# Altium PCB ADM32F036QN56Q_BLDC_Demo_Rev1.0.PcbDoc (part 1 of 2)
Units mm, origin at the board's own origin, x right, y up, seen from the top; angles counter-clockwise.
Board outline 100.03 x 60.1 mm, 4 copper layers (Top Layer, S1, S2, Bottom Layer), stack 0.778 mm thick; 155 components, 87 nets, 444 pads, 417 vias.
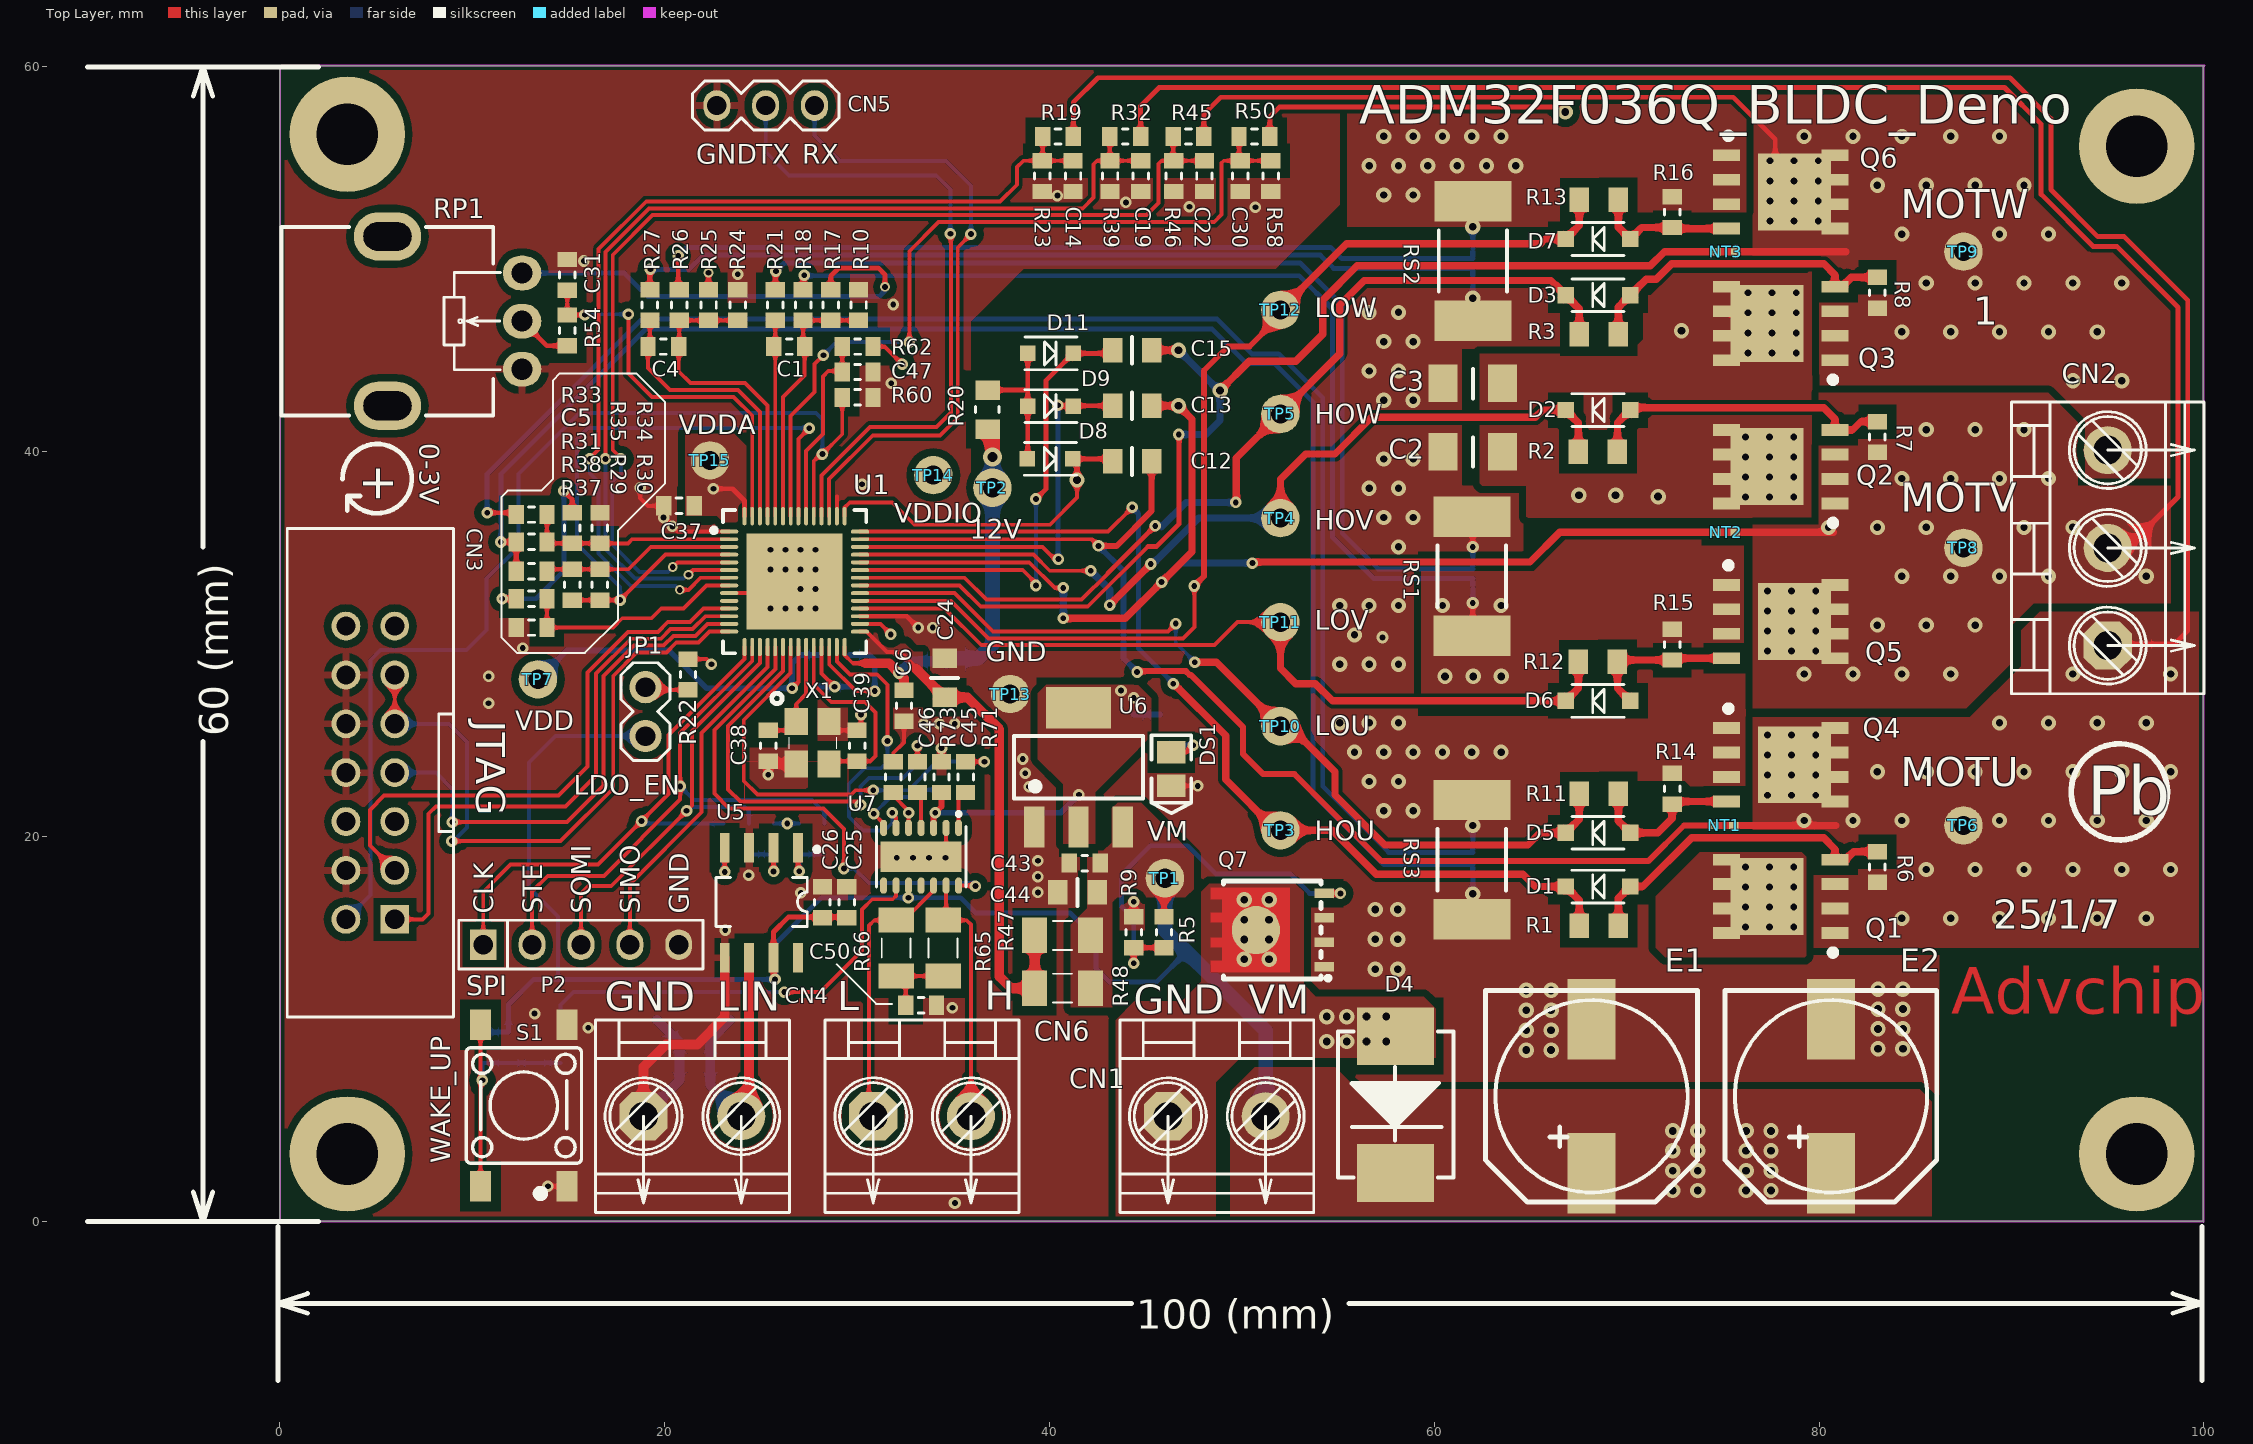
[diagram p0: Top Layer view]
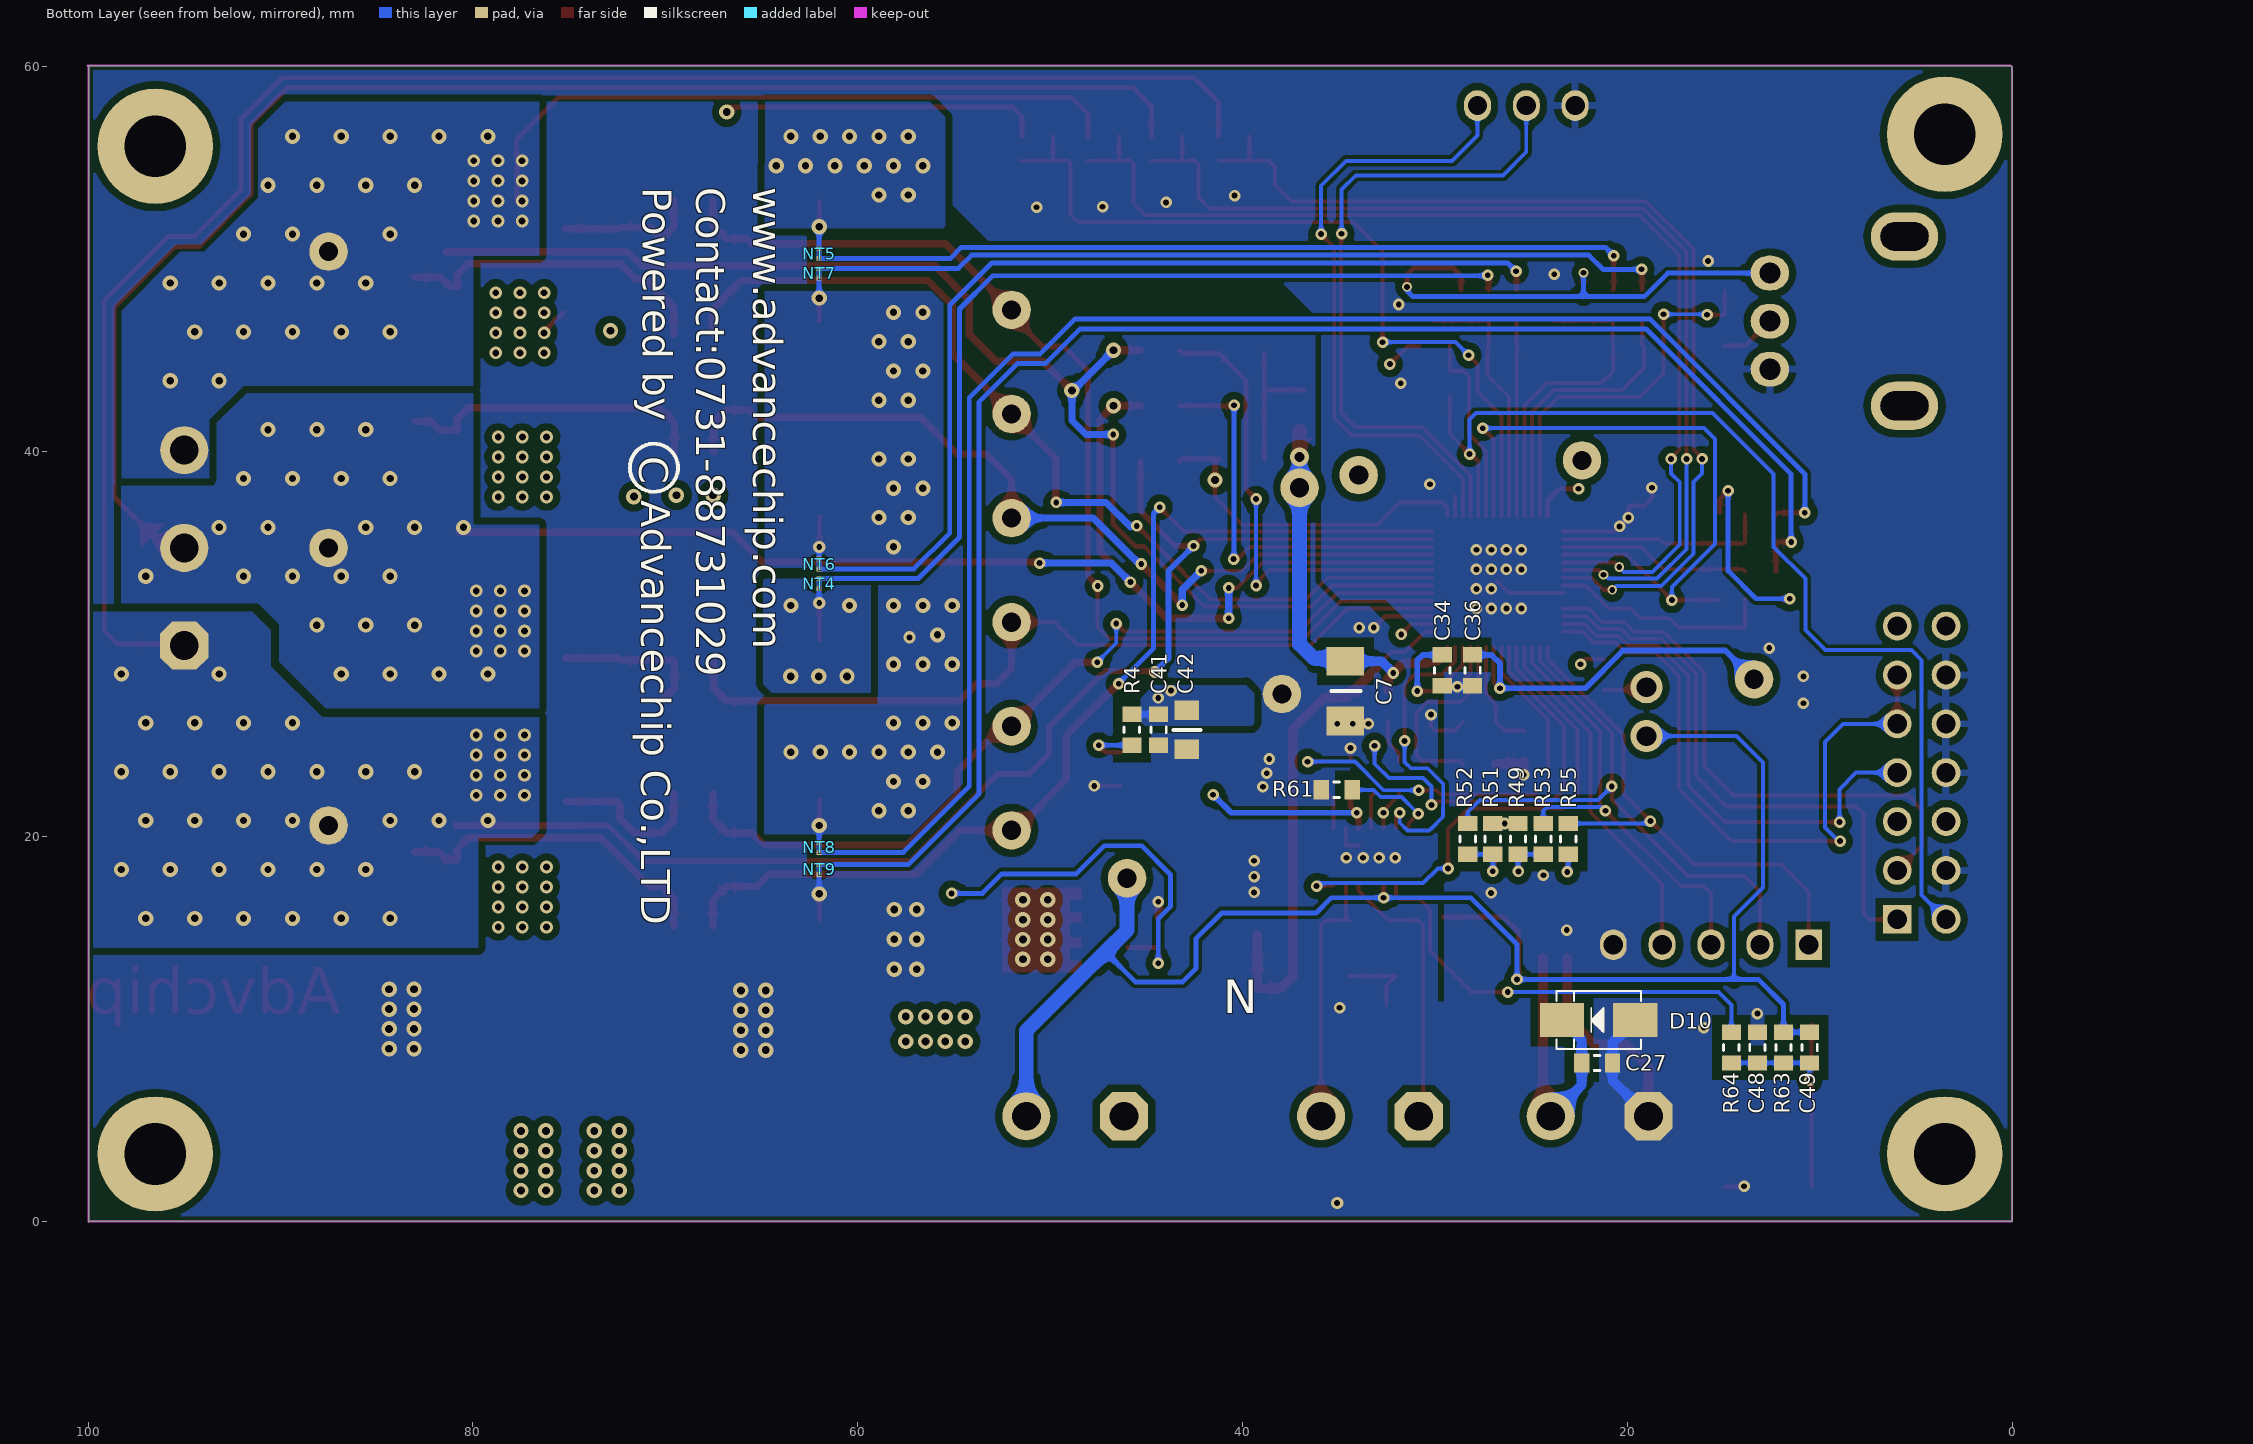
[diagram p1: Bottom Layer view, seen from below]
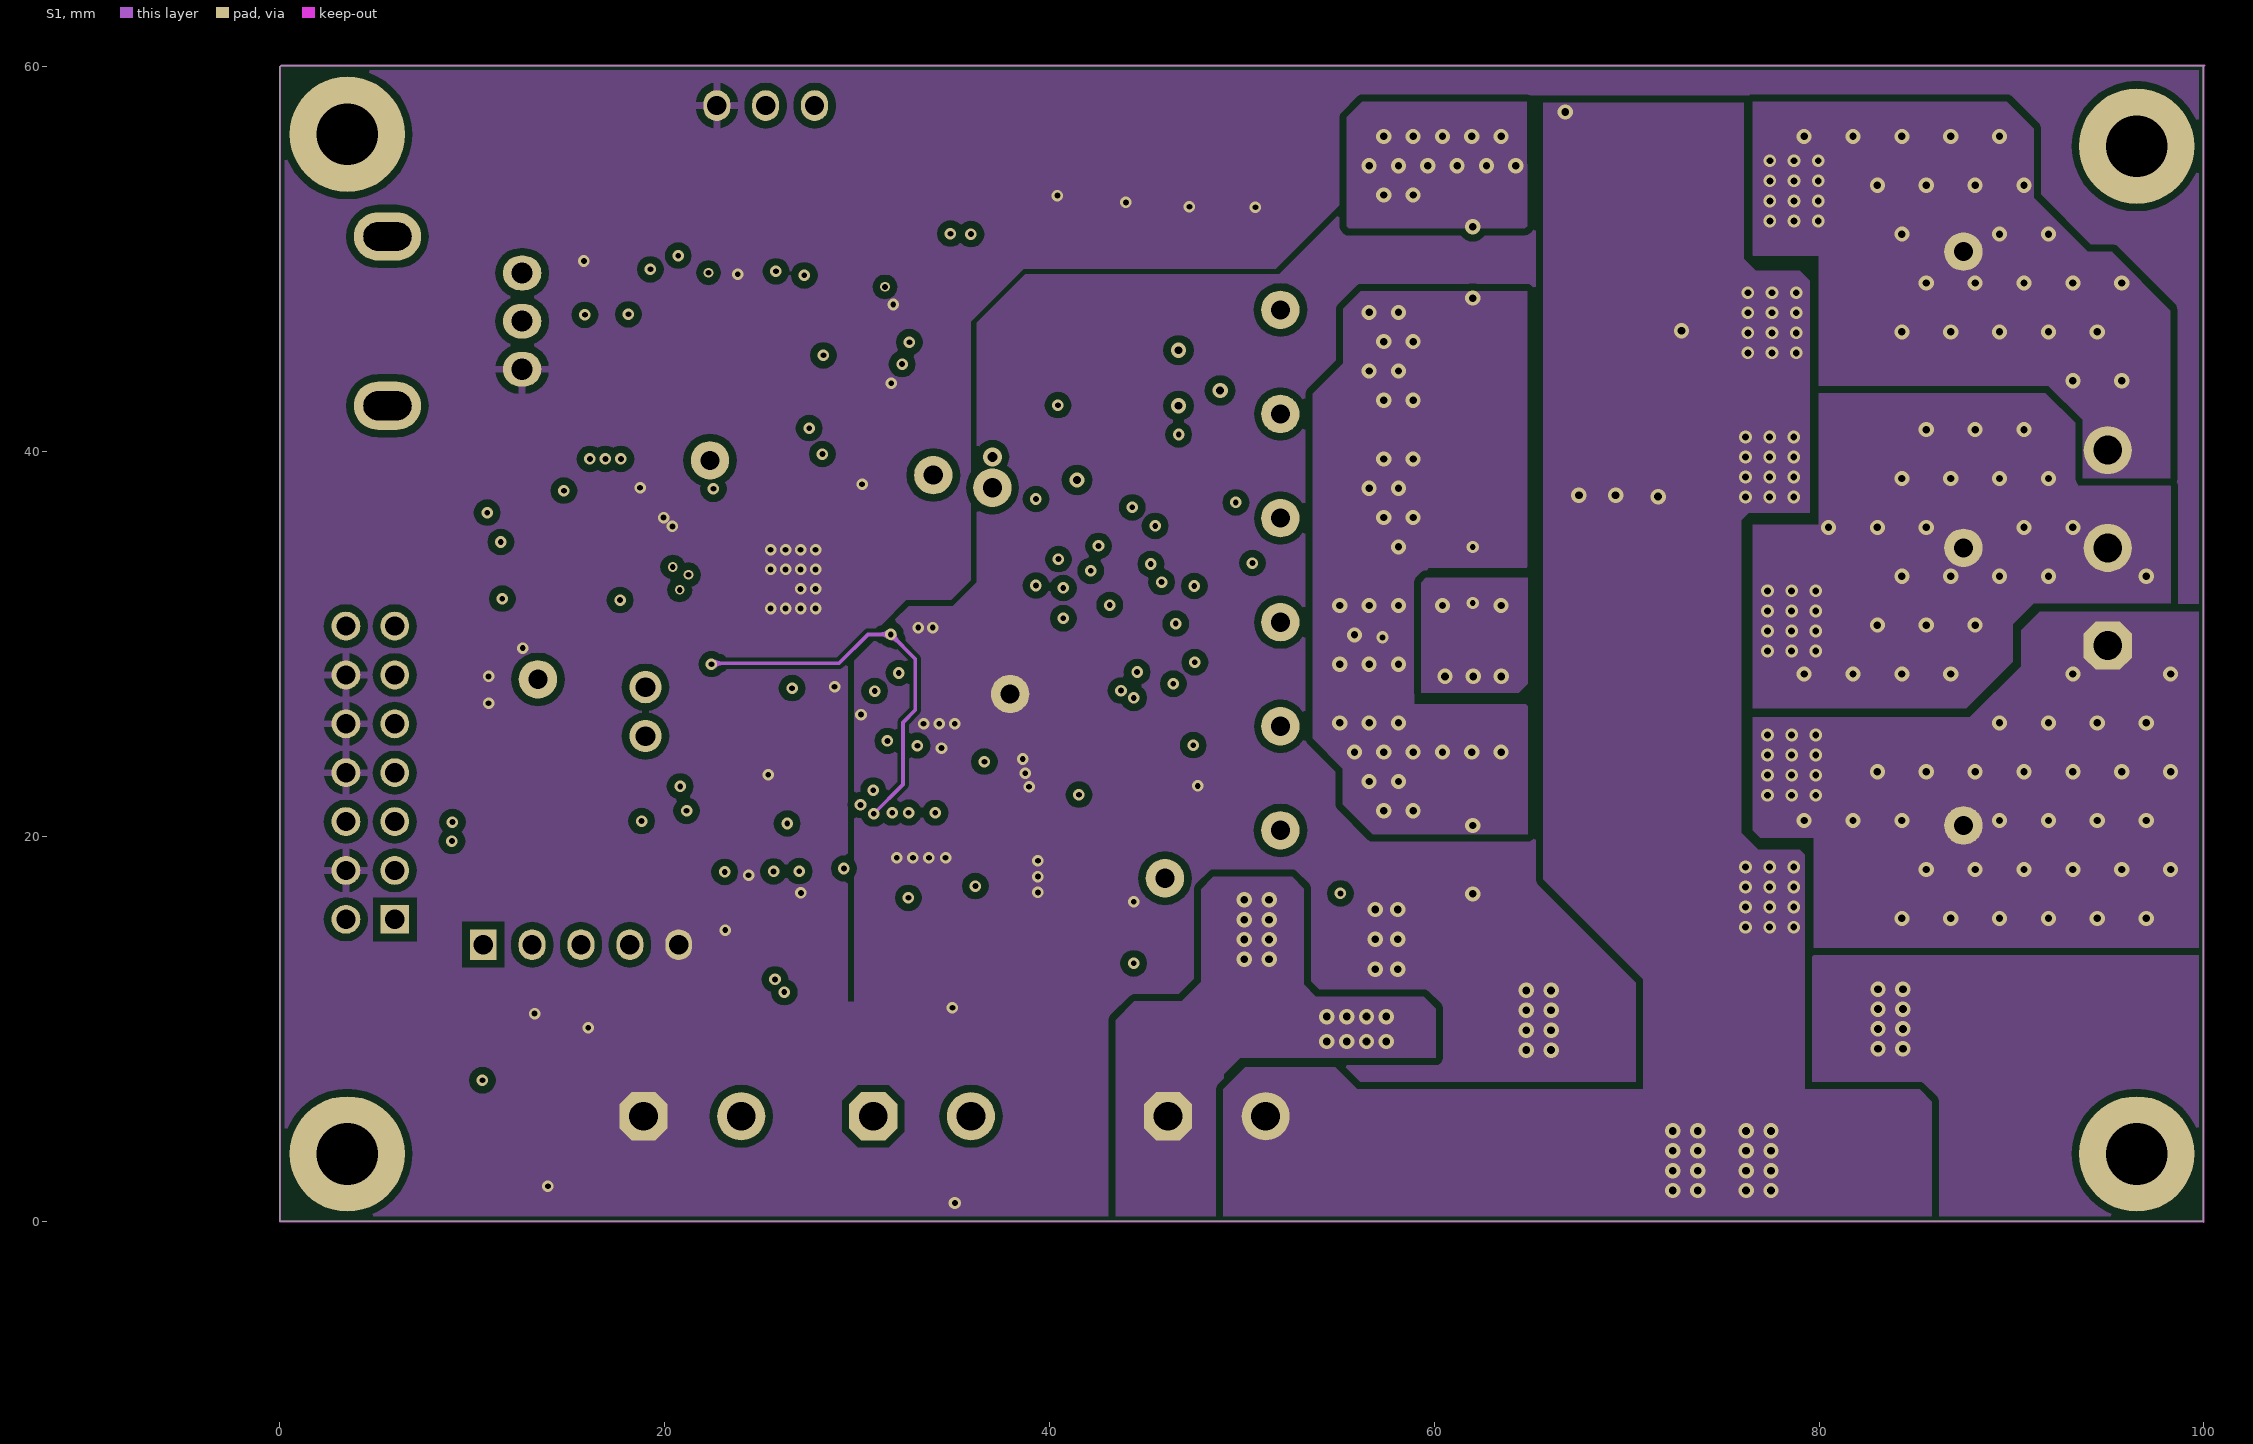
[diagram p2: S1]
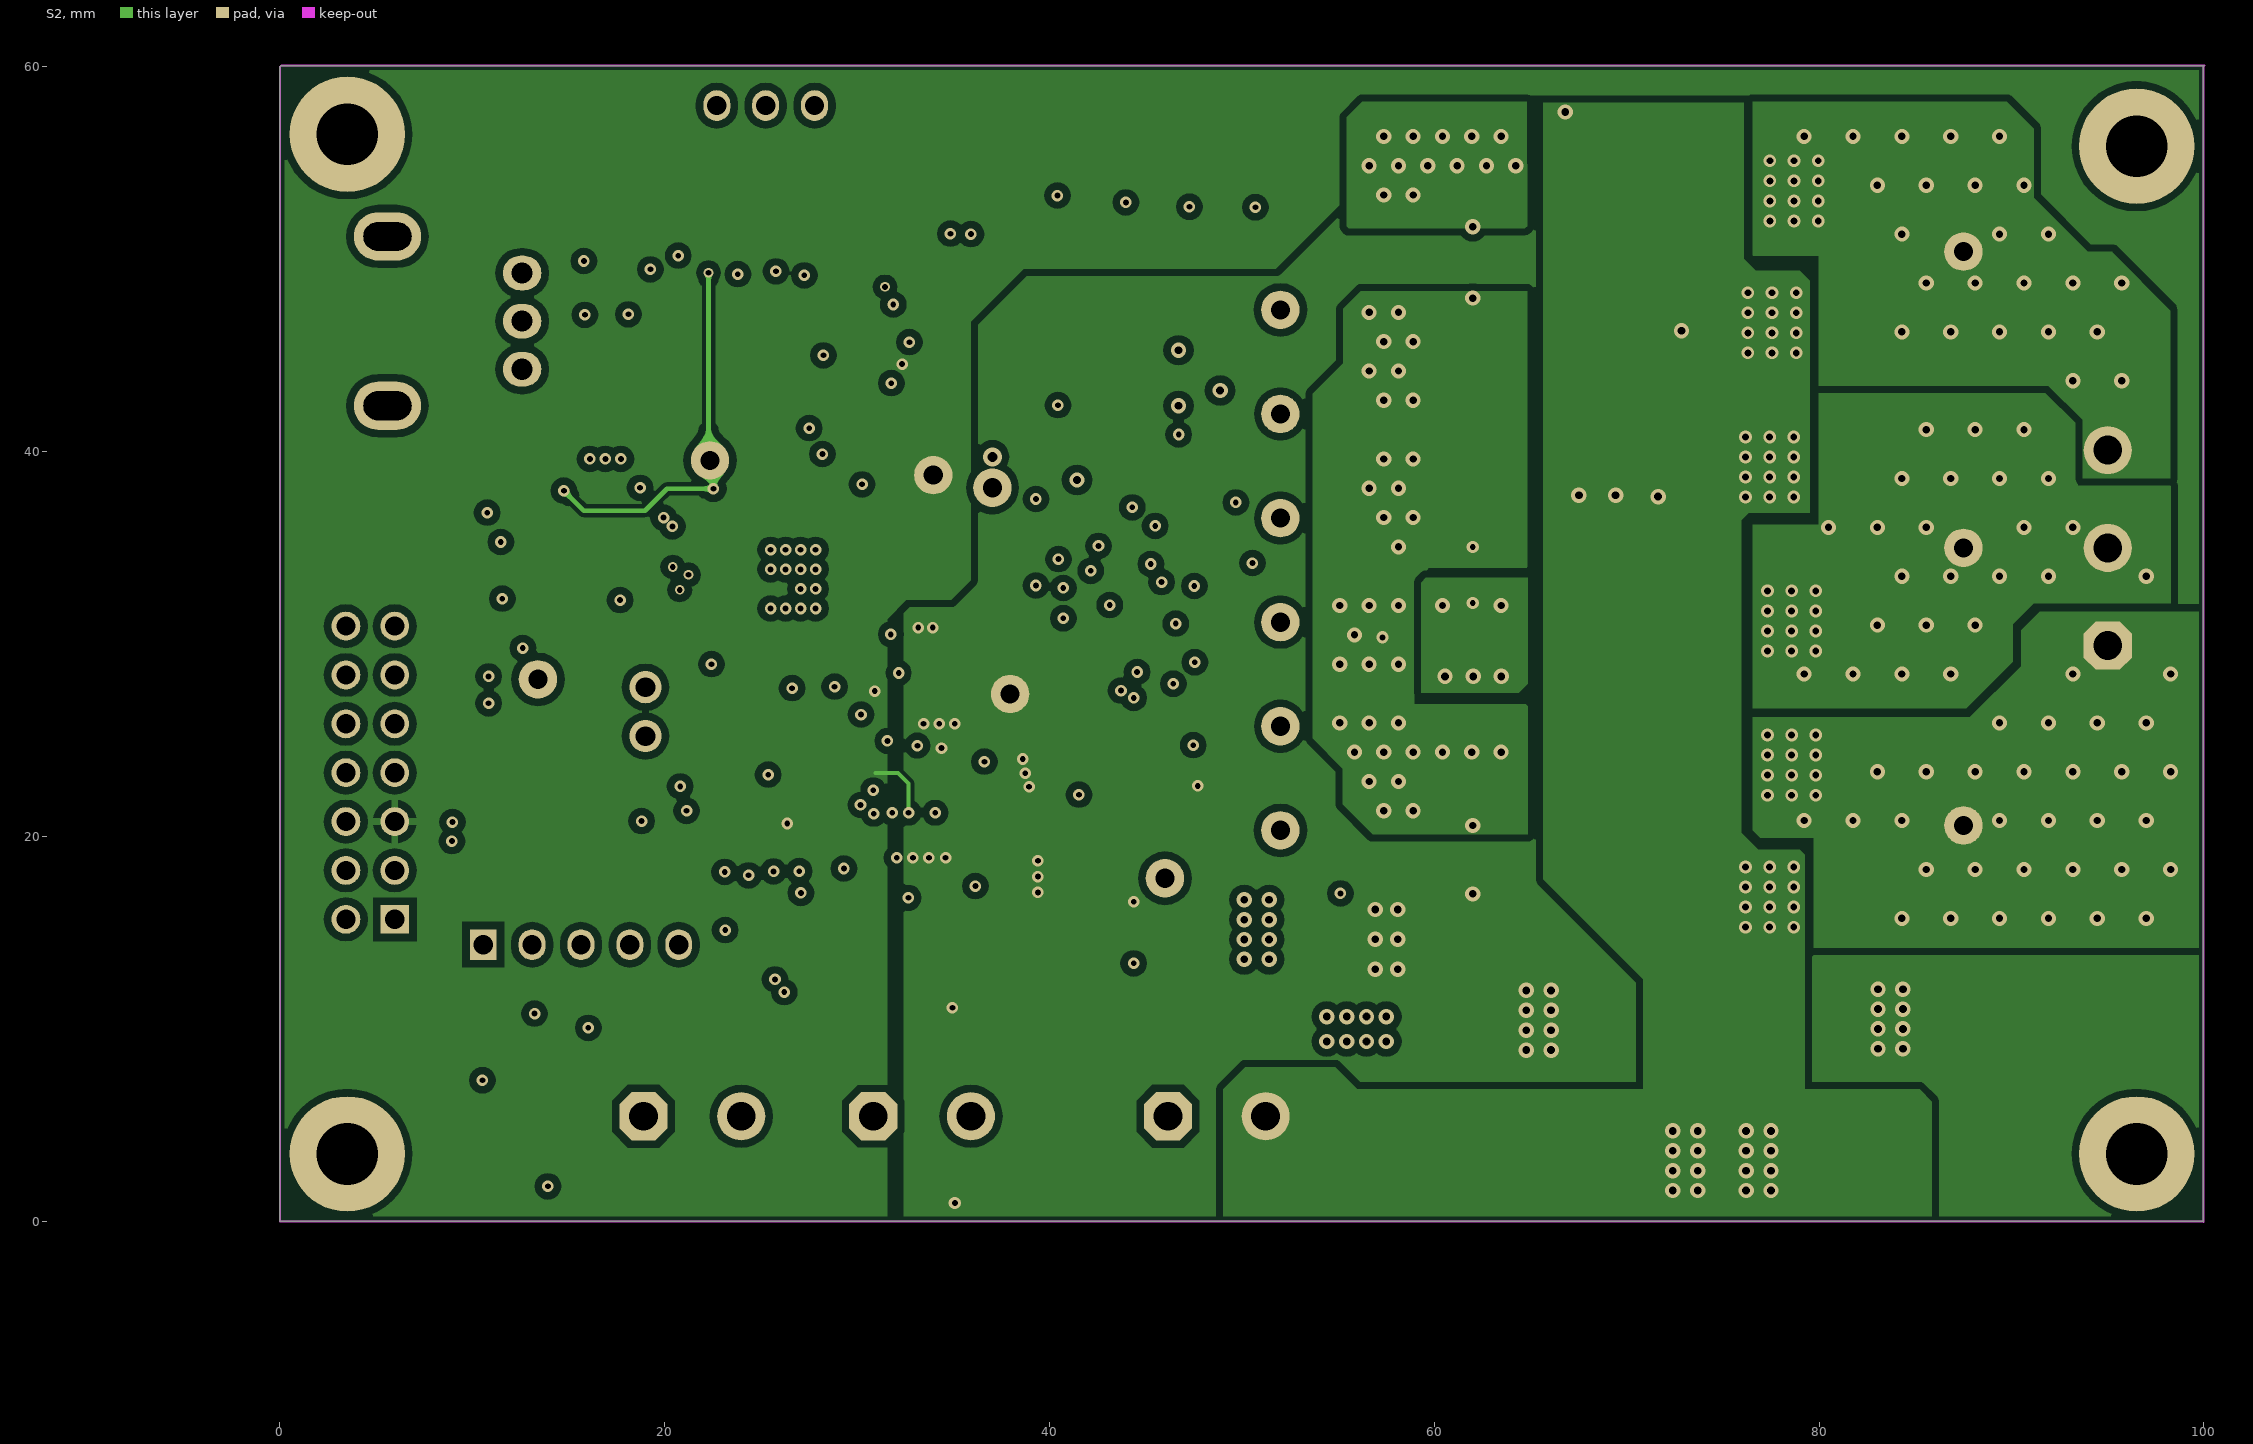
[diagram p3: S2]
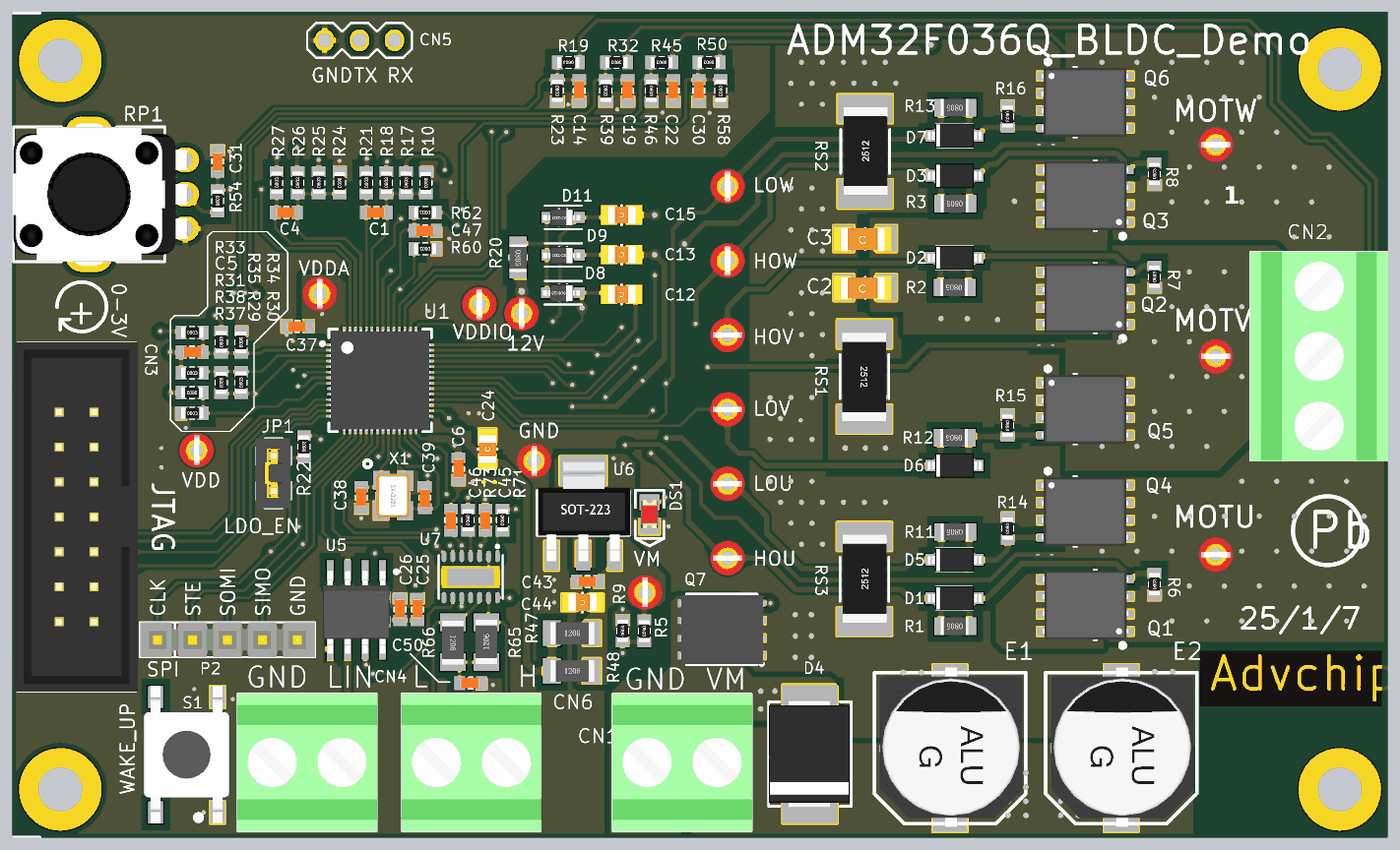
[diagram p5: 3D render of the assembled board from above, using the file's embedded part models]
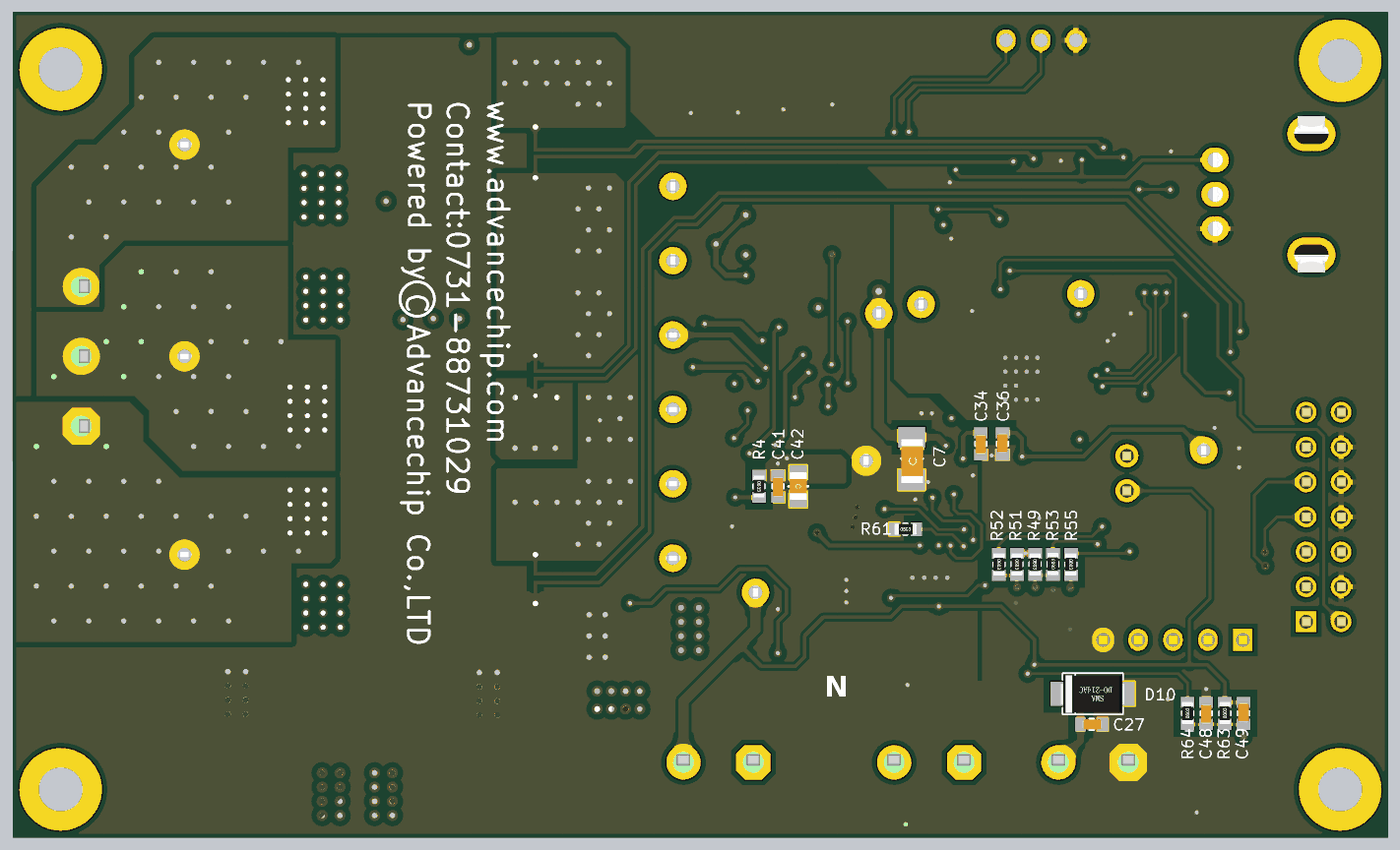
[diagram p6: 3D render of the assembled board from below, using the file's embedded part models]

## Layer stack, top to bottom
Top Solder: solder mask 0.0102, Solder Resist, Dk 3.5
Top Layer: signal copper 0.0356
Dielectric 1: core 0.254, FR-4, Dk 4.2
S1: signal copper 0.036
Dielectric 3: prepreg 0.127, Dk 4.2
S2: signal copper 0.036
Dielectric 2: core 0.254, Dk 4.2
Bottom Layer: signal copper 0.0356
Bottom Solder: solder mask 0.0102, Solder Resist, Dk 3.5

## Board outline
0,0 0,60 0.071,60.071 100.025,60.071 99.975,60.02 99.975,-0.025 99.949,0

## Design rules (kind name [scope] priority, off if disabled: settings)
Clearance Clearance_U1 [InComponent('U1')] p1: gap=0.152 ignorepadtopadclearanceinfootprint=FALSE except(0.381: SMDPad-Fill SMDPad-Poly SMDPad-Region)
Clearance Clearance_T1T2 [(InComponent('T1') OR InComponent('T2'))] p2: gap=0.152 ignorepadtopadclearanceinfootprint=FALSE except(0.254: SMDPad-Fill SMDPad-Poly SMDPad-Region)
Clearance [All] p3: gap=0.203 ignorepadtopadclearanceinfootprint=FALSE except(0.152: Arc-Arc Arc-Track Arc-SMDPad Track-Track Track-SMDPad SMDPad-SMDPad; 0.381: THPad-Fill THPad-Poly THPad-Region Via-Fill Via-Poly Via-Region Fill-Fill Fill-Poly Fill-Region Poly-Poly Poly-Region Region-Region; 0.508: SMDPad-Fill SMDPad-Poly SMDPad-Region)
HoleSize [All] p1: absolutevalues=TRUE maxlimit=20 minlimit=0.025 maxpercent=80.000 minpercent=20.000
MinimumSolderMaskSliver [All] p1: minsoldermaskwidth=0.025
PlaneClearance [All] p1: clearance=0.254
PlaneConnect [InNet('GND')] p1: planeconnectstyle=Relief reliefexpansion=0.508 reliefentries=4 reliefconductorwidth=0.254 reliefairgap=0.254
PolygonConnect PolygonConnect_PAD [(HasFootprint('J-DG128-5') OR HasFootprint('SIP8A') OR HasFootprint('IDC14-L') OR HasFootprint('SIP6A') OR HasFootprint('SO-8') OR HasFootprint('SIP3A') OR HasFootprint('RK09K1130') OR HasFootprint('QFN56-7X7-04P'))] p1: thpad.connectstyle=Relief thpad.reliefconductorwidth=0.381 thpad.reliefentries=4 thpad.polygonreliefangle="90 Angle" thpad.airgapwidth=0.381 smdpad.connectstyle=Relief smdpad.reliefconductorwidth=0.381 smdpad.reliefentries=4 smdpad.polygonreliefangle="90 Angle" smdpad.airgapwidth=0.254 via.connectstyle=Direct via.reliefconductorwidth=0.254 via.reliefentries=4 via.polygonreliefangle="90 Angle" via.airgapwidth=0.254
PolygonConnect [All] p2: connectstyle=Direct reliefconductorwidth=0.254 reliefentries=4 polygonreliefangle="90 Angle" airgapwidth=0.254
RoutingVias [All] p1: holewidth=0.3 width=0.6 viastyle="Through Hole" minholewidth=0.3 minwidth=0.5 maxholewidth=0.711 maxwidth=1.27
SilkToBoardRegionClearance [All] p1 off:
SilkToSilkClearance [All] p1 off: silktosilkclearance=0.254
SilkToSolderMaskClearance [IsPad] p1 off: minsilkscreentomaskgap=0.254 clearancetoexposedcopper=TRUE
SolderMaskExpansion [All] p1: expansion=0.102
Width [All] p1: maxlimit=2.54 minlimit=0.152 preferedwidth=0.203
23 further rules are at their usual default settings.

## Classes and differential pairs
component class BLDC_Driver: C2 C3 C12 C13 C14 C15 C19 C22 C30 C31 C41 C42 C43 C44 CN1 CN2 D1 D2 D3 D4 D5 D6 D7 D8 D9 D11 DS1 E1 E2 NT1 NT2 NT3 NT4 NT5 NT6 NT7 NT8 NT9 Q1 Q2 Q3 Q4 Q5 Q6 Q7 R1 R2 R3 R4 R5 R6 R7 R8 R9 R11 R12 R13 R14 R15 R16 R19 R20 R23 R32 R39 R45 R46 R50 R54 R58 RP1 RS1 RS2 RS3 TP1 TP3 TP4 TP5 TP6 TP8 TP9 TP10 TP11 TP12 TP13 TP28 U6
component class ADM32F036QN56Q: C1 C4 C5 C6 C7 C24 C25 C26 C27 C34 C36 C37 C38 C39 C45 C46 C47 C48 C49 C50 CN3 CN4 CN5 CN6 D10 JP1 P2 R10 R17 R18 R21 R22 R24 R25 R26 R27 R29 R30 R31 R33 R34 R35 R37 R38 R47 R48 R49 R51 R52 R53 R55 R60 R61 R62 R63 R64 R65 R66 R71 R73 S1 TP2 TP7 TP14 TP15 U1 U5 U7 X1

## Components (designator, comment, footprint, x,y, rotation, side; value= is the part's Value field where it differs from the comment)
C1 "NC" C0603 26.473,45.464 r180 top
C2 "1uF/50V" C1206 62,40.005 r180 top value=1uF
C3 "1uF/50V" C1206 62,43.561 r180 top value=1uF
C4 "NC" C0603 19.928,45.464 r180 top
C5 "100pF" C0603 13.079,35.312 r0 top
C6 "0.1uF/50V" C0603 32.436,26.797 r90 top value="TDK C3216X7R1V106KT000E"
C7 "10uF/50V" C1206 34.646,27.56 r270 bottom
C12 "2.2uF/50V" C0805 44.291,39.497 r180 top
C13 "2.2uF/50V" C0805 44.291,42.386 r180 top
C14 "47nF/25V" C0603 41.221,54.324 r90 top value=47nF
C15 "2.2uF/50V" C0805 44.291,45.276 r180 top
C19 "47nF/25V" C0603 44.739,54.324 r90 top value=47nF
C22 "47nF/25V" C0603 48.05,54.324 r90 top value=47nF
C24 "10uF/50V" C0805 34.544,28.245 r90 top
C25 "0.1uF/50V" C0603 29.464,16.586 r90 top value="TDK C3216X7R1V106KT000E"
C26 "2.2uF/50V" C0603 28.194,16.586 r90 top value="TDK C3216X7R1V106KT000E"
C27 "100pF" C0603 21.565,8.23 r180 bottom value="TDK C3216X7R1V106KT000E"
C30 "0.1uF/50V" C0603 49.905,54.324 r90 top
C31 "0.1uF/50V" C0603 14.935,49.189 r270 top value="TDK C3216X7R1V106KT000E"
C34 "2.2uF/25V" C0603 29.616,28.637 r270 bottom value=2.2uF
C36 "2.2uF/25V" C0603 28.042,28.637 r90 bottom value=2.2uF
C37 "2.2uF/25V" C0603 20.739,37.186 r180 top
C38 "22pF/50V" C0603 25.375,24.714 r90 top value=100pF
C39 "22pF/50V" C0603 29.997,24.714 r270 top value=100pF
C41 "0.1uF/50V" C0603 44.36,25.545 r270 bottom value=0.1uF
C42 "10uF/50V" C0805 42.887,25.545 r270 bottom
C43 "0.1uF/50V" C0603 41.828,18.618 r180 top value=0.1uF
C44 "10uF/50V" C0805 41.453,17.094 r180 top
C45 "0.1uF/50V" C0603 34.383,23.089 r270 top value=0.1uF
C46 "0.1uF/50V" C0603 31.877,23.089 r270 top value=0.1uF
C47 "0.1uF/50V" C0603 30.025,44.143 r180 top value="TDK C3216X7R1V106KT000E"
C48 "22nF/50V" C0603 13.234,9.031 r270 bottom value=0.1uF
C49 "0.1uF/50V" C0603 10.524,9.031 r90 bottom value=0.1uF
C50 "4.7nF/50V" C0603 33.325,11.227 r180 top value=0.1uF
CN1 "EK508V-02P" J-EK508V-02P 48.692,5.461 r0 top
CN2 "EK508V-03P" J-EK508V-03P 95,35 r90 top
CN3 "2.54-2X7P" IDC14-L 4.699,23.317 r90 top
CN4 "EK508V-02P" J-EK508V-02P 21.438,5.461 r0 top
CN5 "2.54-3p" sip3a 25.248,57.988 r180 top
CN6 "EK508V-02P" J-EK508V-02P 33.376,5.461 r0 top
D1 "1N4148W" sod-123 68.5,17.399 r180 top
D2 "1N4148W" sod-123 68.5,42.164 r180 top
D3 "1N4148W" sod-123 68.5,48.133 r180 top
D4 "SMCJ26CA" SMC 57.988,6.071 r90 top
D5 "1N4148W" sod-123 68.5,20.193 r180 top
D6 "1N4148W" sod-123 68.5,27.051 r180 top
D7 "1N4148W" sod-123 68.5,51.054 r180 top
D8 "1N4148WS" SOD-323 40.03,39.624 r180 top
D9 "1N4148WS" SOD-323 40.044,42.367 r180 top
D10 "SMAJ18CA" SMA 21.488,10.461 r180 bottom
D11 "1N4148WS" SOD-323 40.044,45.11 r180 top
DS1 "绿色LED" SMD_LED0805_LED 46.33,23.506 r90 top
E1 "100uF/50V" CAP_SMD10*10 68.167,6.5 r90 top
E2 "100uF/50V" CAP_SMD10*10 80.613,6.5 r90 top
JP1 "XH2.54-2P" SIP2C 18.999,26.492 r90 top
NT1 "Net-Tie" Net-Tie_15mil 75.057,20.574 r0 top net-tie
NT2 "Net-Tie" Net-Tie_15mil 75.133,35.814 r0 top net-tie
NT3 "Net-Tie" Net-Tie_15mil 75.152,50.4 r0 top net-tie
NT4 "Net-Tie" Net-Tie_10mil#1 62.001,33.147 r90 bottom net-tie
NT5 "Net-Tie" Net-Tie_10mil#2 62.001,50.292 r90 bottom net-tie
NT6 "Net-Tie" Net-Tie_10mil#1 62.001,34.163 r270 bottom net-tie
NT7 "Net-Tie" Net-Tie_10mil#1 62,49.276 r90 bottom net-tie
NT8 "Net-Tie" Net-Tie_10mil#2 62,19.431 r90 bottom net-tie
NT9 "Net-Tie" Net-Tie_10mil#1 62,18.288 r90 bottom net-tie
P2 "XH2.54-5P母座" SIP5 10.566,14.376 r0 top
Q1 "AD65N10" "POWER 56" 78,16.891 r90 bottom
Q2 "AD65N10" "POWER 56" 78,39.219 r90 bottom
Q3 "AD65N10" "POWER 56" 78,46.662 r90 bottom
Q4 "AD65N10" "POWER 56" 78,23.729 r270 bottom
Q5 "AD65N10" "POWER 56" 78,31.172 r270 bottom
Q6 "AD65N10" "POWER 56" 78,53.5 r270 bottom
Q7 "YJG150N03A" DFN5*6 52.502,15.138 r90 top
R1 "22R" R0805 68.548,15.367 r180 top value=1K
R2 "22R" R0805 68.5,40.005 r180 top value=1K
R3 "22R" R0805 68.548,46.101 r180 top value=1K
R4 "4.7KΩ" R0603 45.745,25.545 r270 bottom value=1K
R5 "10KΩ" R0603 45.949,15.024 r270 top value=1K
R6 "10KΩ" R0603 83.026,18.415 r90 top
R7 "10KΩ" R0603 83.026,40.767 r90 top
R8 "10KΩ" R0603 83.026,48.26 r90 top
R9 "100KΩ" R0603 44.374,15.024 r90 top value=1K
R10 "18K" R0603 30.074,47.625 r270 top value=1K
R11 "22R" R0805 68.548,22.225 r180 top value=1K
R12 "22R" R0805 68.5,29.083 r180 top value=1K
R13 "22R" R0805 68.548,53.086 r180 top value=1K
R14 "10KΩ" R0603 72.358,22.479 r270 top
R15 "10KΩ" R0603 72.358,29.972 r270 top
R16 "10KΩ" R0603 72.358,52.451 r270 top
R17 "18K" R0603 28.632,47.625 r90 top value=1K
R18 "3K" R0603 27.191,47.625 r90 top value=1K
R19 "150KΩ 1%" R0603 40.439,56.382 r180 top
R20 "20R" R0805 36.779,42.189 r270 top
R21 "0R" R0603 25.749,47.625 r90 top value=1K
R22 "100KΩ" R0603 21.209,28.423 r90 top value=1K
R23 "10KΩ 1%" R0603 39.626,54.324 r270 top
R24 "18K" R0603 23.8,47.625 r270 top value=1K
R25 "18K" R0603 22.276,47.625 r90 top value=1K
R26 "3K" R0603 20.752,47.625 r90 top value=1K
R27 "0R" R0603 19.228,47.625 r90 top value=1K
R29 "30KΩ" R0603 15.193,33.088 r270 top value=1K
R30 "30KΩ" R0603 16.63,33.088 r90 top value=1K
R31 "1KΩ" R0603 13.079,33.788 r0 top value=1K
R32 "150KΩ 1%" R0603 43.934,56.382 r180 top
R33 "1KΩ" R0603 13.079,36.735 r0 top value=1K
R34 "30KΩ" R0603 16.63,36.035 r270 top value=1K
R35 "30KΩ" R0603 15.193,36.035 r90 top value=1K
R37 "NC" R0603 13.079,30.861 r0 top value=1K
R38 "NC" R0603 13.079,32.36 r180 top value=1K
R39 "10KΩ 1%" R0603 43.144,54.324 r270 top
R45 "150KΩ 1%" R0603 47.221,56.382 r180 top
R46 "10KΩ 1%" R0603 46.455,54.324 r270 top
R47 "0R" R1206 40.678,14.859 r0 top
R48 "0R" R1206 40.678,12.116 r0 top
R49 "10K" R0603 25.679,19.876 r270 bottom
R50 "150KΩ 1%" R0603 50.648,56.382 r180 top
R51 "10K" R0603 26.987,19.876 r270 bottom
R52 "100R" R0603 28.296,19.876 r270 bottom
R53 "100R" R0603 24.371,19.876 r90 bottom
R54 "1KΩ" R0603 14.935,46.304 r90 top value=1K
R55 "100R" R0603 23.063,19.876 r270 bottom
R58 "10KΩ 1%" R0603 51.5,54.324 r270 top
R60 "2.2KΩ" R0603 30.025,42.823 r180 top value=1K
R61 "100KΩ" R0603 35.103,22.428 r180 bottom value=1K
R62 "10K" R0603 30.025,45.464 r180 top
R63 "3KΩ" R0603 11.879,9.031 r90 bottom value=1K
R64 "33KΩ" R0603 14.588,9.031 r90 bottom value=1K
R65 "30Ω" R1206 34.468,14.199 r90 top value=1K
R66 "30Ω" R1206 32.029,14.199 r270 top value=1K
R71 "100R" R0603 35.636,23.089 r270 top
R73 "100R" R0603 33.13,23.089 r270 top
RP1 "RK09K1130AAU  10KΩ" RK09K1130 5.588,46.787 r90 top
RS1 "50mΩ/3W" R2512 61.944,33.528 r90 top value=1K
RS2 "50mΩ/3W" R2512 62,49.911 r270 top value=1K
RS3 "5mΩ/3W" R2512 61.944,18.796 r270 top value=1K
S1 "6x6x5" SW-PB10 12.675,6.02 r90 top
TP1 "VM" TP-5000-RED 45.999,17.831 r0 top
TP2 "12V" TP-5000-RED 37.033,38.125 r0 top
TP3 "HOU" TP-5000-RED 52,20.32 r90 top
TP4 "HOV" TP-5000-RED 52,36.551 r90 top
TP5 "HOW" TP-5000-RED 52,41.961 r0 top
TP6 "MOTU" TP-5000-RED 87.5,20.574 r90 top
TP7 "VDD" TP-5000-RED 13.411,28.169 r0 top
TP8 "MOTV" TP-5000-RED 87.5,35 r90 top
TP9 "MOTW" TP-5000-RED 87.5,50.4 r90 top
TP10 "LOU" TP-5000-RED 52,25.73 r90 top
TP11 "LOV" TP-5000-RED 52,31.14 r90 top
TP12 "LOW" TP-5000-RED 52,47.371 r0 top
TP13 "GND" TP-5000-RED 37.948,27.407 r0 top
TP14 "VDDIO" TP-5000-RED 33.96,38.786 r0 top
TP15 "VDDA" TP-5000-RED 22.352,39.548 r0 top
U1 "ADM32F036QN56Q" QFN56-7X7-04P 26.746,33.249 r0 top
U5 "TJA1021T/20/CM,118" SO-8 25.019,16.561 r180 top
U6 "SSP7903P50FR" SOT-223 41.504,23.597 r0 top
U7 "SIT1043QTK" VSON-14 33.325,18.948 r270 top
X1 "10MHz" XTAL_3225 27.686,24.867 r270 top

## Footprints (in the part's own frame and the unit in brackets; to place one, negate y for a bottom-side part, rotate by r counter-clockwise, add the part's x,y. Pads: shape width x height; smd on the part's side, far side on the other; paste and mask are expansions set on the pad)
C0603 [mm]
  rect 0.8x1 smd mask+0.051: 1(-0.8,0) 2(0.8,0)
  silkscreen extent -0.15,-0.4 0.15,0.4, body extent -0.71,-0.38 0.81,0.38, height 0.68
C0805 [mil] "标准型 间距40mil"
  rect 40x50 smd: 1(-40,0) 2(40,0)
  silkscreen extent 0,-28 0,28, body extent -59,-28 59,27, height 37
C1206 [mm]
  rect 1.5x1.95 smd: 1(-1.55,0) 2(1.55,0)
  silkscreen extent 0,-0.74 0,0.79, body extent -1.92,-0.86 2.28,0.94, height 0.95
CAP_SMD10*10 [mm] "10*10"
  rect 4.2x2.5 smd: 1(-4,0) 2(4,0)
  silkscreen extent -5.5,-5.5 5.5,5.5, body extent -5.72,-5.23 5.88,5.07, height 10.2
DFN5*6 [mm] "USED for CTN04PN035"
  rect 0.498x1.001 smd: 1(1.905,-1.775) 2(-1.905,-1.775) 2(-0.635,-1.775) 2(0.635,-1.775)
  round 2.5 smd: 3(0,1.775)
  Top Layer region: -2.2,0.025 -2.2,4.125 -1.6,4.125 -1.6,3.525 -0.9,3.525 -0.9,4.125 -0.4,4.125 -0.4,3.525 0.4,3.525 0.4,4.125 0.9,4.125 0.9,3.525 1.6,3.525 1.6,4.125 2.2,4.125 2.2,0.025
  silkscreen extent -2.6,-2.08 2.54,3.47, body extent -2.53,-2.16 2.47,3.94, height 0.95
IDC14-L [mm]
  rect 1.5x1.5 hole 1: 1(-7.62,-1.27)
  round 1.5 hole 1: 2(-7.62,1.27) 3(-5.08,-1.27) 4(-5.08,1.27) 5(-2.54,-1.27) 6(-2.54,1.27) 7(0,-1.27) 8(0,1.27) 9(2.54,-1.27) 10(2.54,1.27) 11(5.08,-1.27) 12(5.08,1.27) 13(7.62,-1.27) 14(7.62,1.27)
  silkscreen extent -12.7,-4.32 12.7,4.32, body extent -12.72,-4.44 12.72,4.67, height 9.1
J-EK508V-02P [mm]
  oct 2.5x2.5 hole 1.5: 1(-2.54,0)
  round 2.5 hole 1.5: 2(2.54,0)
  silkscreen extent -5.04,-5 5.04,5, body extent -5.08,-5 5.08,5, height 13.8
J-EK508V-03P [mm]
  oct 2.5x2.5 hole 1.5: 1(-5.08,0)
  round 2.5 hole 1.5: 2(0,0) 3(5.08,0)
  silkscreen extent -7.58,-5 7.58,5, body extent -7.62,-5 7.62,5, height 13.8
Net-Tie_10mil#1 [mil]
  rect 10x10 smd paste-5 mask-5: 1(10,0) 2(-10,0)
  Top Layer region: 6,-5 -6,-5 -6,5 6,5
Net-Tie_10mil#2 [mil] "10mil net tie, no solder mask opening, no solder paste"
  rect 10x10 smd paste-5 mask-5: 1(-10,0) 2(10,0)
  Top Layer region: -6,5 6,5 6,-5 -6,-5
Net-Tie_15mil [mil] "网络连接点"
  rect 20x15 smd paste-5 mask-5: 1(-20,0) 2(20,0)
  Top Layer region: -20,7 20,7 20,-7 -20,-7
"POWER 56" [mm]
  rect 0.61x1.4 smd far side: 1(-1.905,2.816) 2(-0.635,2.816) 3(0.635,2.816) 4(1.905,2.816) 5(1.905,-2.816) 6(0.635,-2.816) 7(-0.635,-2.816) 8(-1.905,-2.816)
  rect 4x3.81 smd far side: 9(0,-0.716)
  body extent -2.61,-3.1 2.64,3.14, height 1.09
QFN56-7X7-04P [mm]
  rect 5x5 smd mask+0.051: 0(0,0)
  oval 0.95x0.2 smd mask+0.051: 1(-3.4,2.6) 2(-3.4,2.2) 3(-3.4,1.8) 4(-3.4,1.4) 5(-3.4,1) 6(-3.4,0.6) 7(-3.4,0.2) 8(-3.4,-0.2) 9(-3.4,-0.6) 10(-3.4,-1) 11(-3.4,-1.4) 12(-3.4,-1.8) 13(-3.4,-2.2) 14(-3.4,-2.6) 29(3.4,-2.6) 30(3.4,-2.2) 31(3.4,-1.8) 32(3.4,-1.4) 33(3.4,-1) 34(3.4,-0.6) 35(3.4,-0.2) 36(3.4,0.2) 37(3.4,0.6) 38(3.4,1) 39(3.4,1.4) 40(3.4,1.8) 41(3.4,2.2) 42(3.4,2.6)
  oval 0.2x0.95 smd mask+0.051: 15(-2.6,-3.4) 16(-2.2,-3.4) 17(-1.8,-3.4) 18(-1.4,-3.4) 19(-1,-3.4) 20(-0.6,-3.4) 21(-0.2,-3.4) 22(0.2,-3.4) 23(0.6,-3.4) 24(1,-3.4) 25(1.4,-3.4) 26(1.8,-3.4) 27(2.2,-3.4) 28(2.6,-3.4) 43(2.6,3.4) 44(2.2,3.4) 45(1.8,3.4) 46(1.4,3.4) 47(1,3.4) 48(0.6,3.4) 49(0.2,3.4) 50(-0.2,3.4) 51(-0.6,3.4) 52(-1,3.4) 53(-1.4,3.4) 54(-1.8,3.4) 55(-2.2,3.4) 56(-2.6,3.4)
  silkscreen extent -4.32,-3.72 3.73,3.73, body extent -3.65,-3.65 3.66,3.66, height 1
R0603 [mm] "无丝印 脚距1.6mm  0.8/1mm 焊盘"
  rect 0.8x1 smd mask+0.051: 1(-0.8,0) 2(0.8,0)
  silkscreen extent -0.15,-0.4 0.15,0.4, body extent -0.79,-0.4 0.81,0.4, height 0.43
R0805 [mil] "标准型  间距40mil"
  rect 40x50 smd: 1(-40,0) 2(40,0)
  body extent -38,-25 41,25, height 22
R1206 [mm]
  rect 1.3x1.85 smd: 1(-1.45,0) 2(1.45,0)
  silkscreen extent -0.5,-0.75 0.5,0.75, body extent -1.57,-0.8 1.63,0.8, height 0.6
R2512 [mm] "SMD, 2-Leads, Body 6.45x3.35mm, Pitch 6.2mm"
  rect 2.1x4 smd: 1(3.1,0) 2(-3.1,0)
  silkscreen extent -1.6,-1.78 1.6,1.78, body extent -3.23,-1.57 3.17,1.63, height 0.6
RK09K1130 [mm] "立式可调电位器"
  oval 2.5x3.5 hole 1.5 slot 2.5 at 90 deg: 0(-4.4,0) 0(4.4,0)
  oval 1.8x2 hole 1.1: 1(-2.5,-7) 2(0,-7) 3(2.5,-7)
  silkscreen extent -4.9,-5.88 4.9,5.5, body extent -5.7,-7.15 5.7,5.5, height 19.5
SIP2C [mil]
  round 66 hole 40 paste-4: 1(50,0) 2(-50,0)
  silkscreen extent -100,-50 100,50, body extent -100,-50 100,52, height 344
sip3a [mm]
  oval 1.4x1.6 hole 1 paste-0.102: 1(-2.54,0) 2(0,0) 3(2.54,0)
  silkscreen extent -3.81,-1.27 3.81,1.27
SIP5 [mm]
  rect 1.4x1.6 hole 1: 1(0,0)
  oval 1.4x1.6 hole 1: 2(2.54,0) 3(5.08,0) 4(7.62,0) 5(10.16,0)
  silkscreen extent -1.27,-1.27 11.43,1.27, body extent -1.27,-1.27 11.43,1.27, height 8.89
SMA [mm] "DO-214AC"
  rect 2.3x1.75 smd: 1(1.9,0) 2(-1.9,0)
  silkscreen extent -2.2,-1.5 2.2,1.5, body extent -2.3,-1.37 2.3,1.33, height 2.4
SMC [mm]
  rect 3x4 smd: 1(3.555,0) 2(-3.555,0)
  silkscreen extent -3.8,-3 3.8,3, body extent -3.9,-2.9 3.9,3, height 2.4
SMD_LED0805_LED [mm]
  rect 1.16x1.47 smd: 1(0.875,0) 2(-0.875,0)
  silkscreen extent -2.3,-1.04 1.76,1.03, body extent -1.01,-0.62 1.01,0.62, height 1.1
SO-8 [mil]
  rect 20x60 smd: 1(-75,-112.5) 2(-25,-112.5) 3(25,-112.5) 4(75,-112.5) 5(75,112.5) 6(25,112.5) 7(-25,112.5) 8(-75,112.5)
  silkscreen extent -119,-114 93,49, body extent -96,-111 96,125, height 64
sod-123 [mm]
  rect 0.85x0.85 smd: 1(-1.675,0) 2(1.675,0)
  silkscreen extent -1.35,-0.85 1.35,0.85, body extent -1.95,-0.9 1.95,0.9, height 1.18
SOD-323 [mm]
  rect 0.8x0.8 smd: A(1.18,0) K(-1.18,0)
  silkscreen extent -1.38,-0.85 1.32,0.85, body extent -1.25,-0.6 1.45,0.65, height 1.1
SOT-223 [mm] "SOT-223/SC-73; 4 Leads; Body 6.7 x 7.3 mm, inc. leads (LxW max)"
  rect 1.05x2.15 smd: 1(-2.3,-3.1) 2(0,-3.1) 3(2.3,-3.1)
  rect 3.4x2.15 smd: 2(0,3.1)
  silkscreen extent -3.35,-1.63 3.35,1.63, body extent -3.3,-3.5 3.4,3.71, height 1.85
SW-PB10 [mm] "SMD"
  rect 1.6x1.1 smd: 1(-4.2,-2.25) 2(4.2,-2.25) 3(4.2,2.25) 4(-4.2,2.25)
  silkscreen extent -4.77,-3 3,3, body extent -5,-3 5,3, height 4.97
TP-5000-RED [mm] "KEYSTONE红色测试点"
  round 2 hole 1: 1(0,0)
  body extent -1.27,-1.27 1.27,1.27, height 4.89
VSON-14 [mil]
  oval 33.35x14.33 smd paste-3937 mask+2: 1(-59,76.77) 2(-59,51.18) 3(-59,25.59) 4(-59,0) 5(-59,-25.59) 6(-59,-51.18) 7(-59,-76.77) 8(59,-76.77) 9(59,-51.18) 10(59,-25.59) 11(59,0) 12(59,25.59) 13(59,51.18) 14(59,76.77)
  rect 62.99x165.35 smd paste-3937 mask+2: 15(0,0)
  silkscreen extent -91,-92 62,92
XTAL_3225 [mm] "3225晶振"
  rect 1.4x1.2 smd mask+0.051: 1(-1.1,-0.85) 2(1.1,-0.85) 3(1.1,0.85) 4(-1.1,0.85)
  silkscreen extent -2.58,-2.12 0.3,1.25, body extent -1.6,-1.25 1.6,1.25, height 0.81

## Part data
C1 C2 C3 C4 C5 C6 C7 C14 C19 C22 C24 C25 C26 C27 C30 C31 C34 C36 C41 C42 C43 C44 C45 C46 C47 C48 C49 C50: library part Cap, "贴片电容", LatestRevisionDate=17-Jul-2002, LatestRevisionNote="Re-released for DXP Platform.", Published=8-Jun-2000, Publisher="Altium Limited"
C12 C13 C15: library part CAP-CC(SMD), "贴片电容"
C37: library part C, "贴片电容"
C38 C39: library part Cap, "COG贴片电容", LatestRevisionDate=17-Jul-2002, LatestRevisionNote="Re-released for DXP Platform.", Published=8-Jun-2000, Publisher="Altium Limited"
CN1 CN4 CN6: library part CON2A, "连接器"
CN2: library part Motor2, "连接器", LatestRevisionDate=17-Jul-2002, LatestRevisionNote="Re-released for DXP Platform.", Published=24-Mar-1999, Publisher="Altium Limited"
CN3: library part Receptacle_7X2, "简易牛角座连接器 卧式"
CN5: library part CON3A, "连接器"
D1 D2 D3 D5 D6 D7: library part M7, "二极管", PackageDocument=Aug-1999, Code_JEDEC=DO-204-AL, DatasheetDocument=1998, LatestRevisionDate=17-Jul-2002, LatestRevisionNote="Re-released for DXP Platform.", PackageReference=DO-41, Published=8-Jun-2000, Publisher="Altium Limited"
D4 D10: library part TVS, "TVS二极管", LatestRevisionDate=17-Jul-2002, LatestRevisionNote="Re-released for DXP Platform.", Published=8-Jun-2000, Publisher="Altium Limited"
D8 D9 D11: library part 1N4004, "二极管"
DS1: library part LED0, "LED", LatestRevisionDate=08-Jul-2005, LatestRevisionNote="Mech Layer 1 removed.", PackageDescription="LED; 2 Leads", PackageReference=LED-0, Published=8-Jun-2000, Publisher="Altium Limited"
E1 E2: library part CMP-0011224-2, "贴片电解电容", PartNumber=EEETP1H102M
JP1: library part JP2, "连接器+跳线帽"
NT1 NT2 NT3 NT4 NT5 NT6 NT7 NT8 NT9: library part CMP-0078142-1, "PCB网络短接点", Manufacturer=N/A, CompType=Net-Tie, MountType=SMT, PackageReference=N/A, PartNumber=N/A
P2: library part CON5, "连接器"
Q1 Q2 Q3 Q4 Q5 Q6: library part BSC190N15NS3G, "安德斯诺N-MOSFET  100V,6mR,65A"
  Q2 Q3 Q4 Q5 Q6: Code_JEDEC=TO-220-AB, DatasheetDocument=PD-9.814, LatestRevisionDate=17-Jul-2002, LatestRevisionNote="Re-released for DXP Platform.", Note="Pin 2 is electrically connected to pin 4.", PackageReference=TO-220AB, Published=8-Jun-2000, Publisher="Altium Limited"
Q7: library part NMOSFET, "N-MOSFET", Vth=0.8~1.5V, 替代料="AO3400A  0.7~1.4V"
R1 R2 R3 R4 R5 R6 R7 R8 R9 R10 R11 R12 R13 R14 R15 R16 R17 R18 R19 R21 R22 R23 R24 R25 R26 R27 R29 R30 R31 R32 R33 R34 R35 R37 R38 R39 R45 R46 R47 R48 R50 R54 R58 R60 R61 R63 R64 R65 R66: library part Res, "贴片电阻", LatestRevisionDate=17-Jul-2002, LatestRevisionNote="Re-released for DXP Platform.", Published=8-Jun-2000, Publisher="Altium Limited"
R20: library part RES(SMD), "贴片电阻"
R49 R51 R52 R53 R55 R62 R71 R73: library part 10K/1%, "------", Add into BOM=yes, Convert to PCB=yes, Design Item ID=Res, Device=10K/1%, LatestRevisionDate=17-Jul-2002, LatestRevisionNote="Re-released for DXP Platform.", Origin Footprint=0603R-X, Published=8-Jun-2000, Publisher="Altium Limited", Symbol=Res
  R49 R51 R62: Name=10K
  R52 R53 R55 R71 R73: Name=1K
RP1: library part "RPot SM", "立式可调电位器", DatasheetDocument=Oct-2003, Published=17-Dec-2003, Publisher="Altium Limited"
RS1 RS2 RS3: library part Res, "贴片采样电阻", LatestRevisionDate=17-Jul-2002, LatestRevisionNote="Re-released for DXP Platform.", Published=8-Jun-2000, Publisher="Altium Limited"
S1: library part SW6X6X5mm, "贴片轻触开关 6x6x5mm"
TP1 TP2 TP3 TP4 TP5 TP6 TP7 TP8 TP9 TP10 TP11 TP12 TP13 TP14 TP15: library part TP, "测试点"
U1: "进芯电机驱动专用芯片"
U5: JLCPCB Part Class="Extended Part", Operating Temperature=-, Supply Voltage="5.5V ~ 27V", Add into BOM=yes, Convert to PCB=yes, Datasheet=https://atta.szlcsc.com/upload/public/pdf/source/20170914/C128810_1505359876382968052.pdf, Device=TJA1021T/20/CM,118, LCSC Part Name=TJA1021T/20/CM,118, Manufacturer Part=TJA1021T/20/CM,118, Name=TJA1021T/20/CM,118, Protocol=LINbus, Receiver Hysteresis=175mV, Supplier=LCSC, Supplier Footprint=SOIC-8, Supplier Part=C128810, Symbol=TJA1021T/20/CM,118
U6: library part ASM1117-3.3V, "线性稳压器"
U7: library part SIT1043QT, JLCPCB Part Class="Extended Part", Manufacturer=SIT(о????), Add into BOM=yes, Convert to PCB=yes, Datasheet=https://atta.szlcsc.com/upload/public/pdf/source/20230627/8FCFD20DE052EC106BC7CFF9B7B75632.pdf, Device=SIT1043QT, LCSC Part Name=SIT1043QT, Manufacturer Part=SIT1043QT, Supplier=LCSC, Supplier Footprint=SOP-14, Supplier Part=C7433974, Symbol=SIT1043QT
X1: library part 3TJ410000ZYLBC, Equivalent Series Resistance (ESR)=150Ω, External load capacitor=20pF, Frequency Stability(Full temperature range)=±30ppm, JLCPCB Part Class="Extended Part", LCSC Part Name="10MHz ±10ppm 20pF", Manufacturer=JYJE(晶友嘉), Normal temperature Frequency Tolerance=±10ppm, Operating Temperature=-40℃~+85℃, Add into BOM=yes, Convert to PCB=yes, Crystal Type=贴片晶振, Datasheet=https://atta.szlcsc.com/upload/public/pdf/source/20210922/C2898998_79DA4CA19A36528DCEC4420D32E637EE.pdf, Device=3TJ410000ZYLBC, Manufacturer Part=3TJ410000ZYLBC, Name=10MHz, Supplier=LCSC, Supplier Footprint=SMD3225-4P, Supplier Part=C2898998, Symbol=3TJ410000ZYLBC

## Free pads (board coordinates)
  round 6 hole 3.2: 1(3.5,3.5) 1(3.5,56.5) 1(96.5,3.5) 1(96.5,55.88)

## Via types
v1: diameter 0.6, hole 0.3, Top Layer to Bottom Layer, tented both sides, 135 vias
v2: diameter 0.787, hole 0.381, Top Layer to Bottom Layer, tented both sides, 130 vias
v3: diameter 0.66, hole 0.356, Top Layer to Bottom Layer, tented bottom, 72 vias
v4: diameter 0.8, hole 0.4, Top Layer to Bottom Layer, tented both sides, 66 vias
v5: diameter 0.5, hole 0.3, Top Layer to Bottom Layer, tented both sides, 5 vias
v6: diameter 0.635, hole 0.305, Top Layer to Bottom Layer, tented both sides, 4 vias
v7: diameter 0.787, hole 0.381, Top Layer to Bottom Layer, tented bottom, 4 vias
v8: diameter 1, hole 0.5, Top Layer to Bottom Layer, tented both sides, 1 vias

## Nets (pads, with @x,y where several pads share a name; then routed paths per layer and width w, separated by ;. In a path a pad name is that pad's centre, name@x,y a point inside that pad or via, vN(x,y) a via of type N, cw(c..) or ccw(c..) an arc to the next point about the centre after c; other vN are vias at no path point)
+12VDC: C6.2 C7.1 R20.2 TP2.1 U1.28 | length 21.2
  Top Layer w0.2: U1.28@29.346,29.849 29.346,29.429 29.769,29.007 30.429,29.007
  Top Layer w0.508: 30.429,29.007 31.648,29.007 v1(32.156,28.499) 32.436,28.219 C6.2@32.436,27.597
  Top Layer w0.762: v8(37.033,39.726) R20.2@37.033,41.072
  Bottom Layer w0.5: v1(32.156,28.499) 32.767,29.11 C7.1@34.646,29.11
  Bottom Layer w0.762: C7.1@34.646,29.11 34.796,29.26 36.295,29.26 37.033,29.997 TP2.1@37.033,38.125 v8(37.033,39.726)
ADC_POT: C31.2 R54.2 U1.55 | length 20.1
  Top Layer w0.203: C31.2@14.935,48.389 R54.2@14.935,47.104 15.837,47.104 v1(15.85,47.117) ; v1(18.11,47.142) 18.11,44.069 19.329,42.85 23.571,42.85 24.546,41.875 U1.55@24.546,36.649
  Bottom Layer w0.203: v1(15.85,47.117) 15.875,47.142 v1(18.11,47.142)
CAN_H: CN6.2 R65.2 U7.13 | length 13.4
  Top Layer w0.203: U7.13@34.625,17.45 34.625,15.806 R65.2@34.468,15.649 35.685,15.649 35.916,15.418 CN6.2@35.916,5.461
CAN_L: CN6.1 R66.1 U7.12 | length 14.4
  Top Layer w0.203: CN6.1@30.836,5.461 30.607,5.69 30.607,15.367 30.889,15.649 R66.1@32.029,15.649 32.438,15.649 33.975,17.185 U7.12@33.975,17.45
CANRXA: R73.1 U1.20 | length 22
  Top Layer w0.203: U1.20@26.146,29.849 26.146,28.597 23.292,25.742 23.292,22.454 23.927,21.819 29.997,21.819 v1(30.175,21.641) ; R73.1@33.13,23.889 v1(33.13,24.723)
  Bottom Layer w0.203: v1(30.175,21.641) 30.175,22.598 30.615,23.038 32.385,23.038 33.13,23.783 v1(33.13,24.723)
CANTXA: R71.1 U1.21 | length 22.5
  Top Layer w0.203: U1.21@26.546,29.849 26.546,28.494 24.105,26.052 24.105,22.885 24.816,22.174 29.693,22.174 29.921,22.403 v1(30.836,22.403) ; R71.1@35.636,23.889 v1(36.614,23.889)
  Bottom Layer w0.203: v1(30.836,22.403) 32.664,22.403 34.15,23.889 v1(36.614,23.889)
COMP1_REF: R37.2 R38.1 U1.8 | length 11.9
  Top Layer w0.203: R38.1@13.879,32.36 R37.2@13.879,30.861 17.308,30.861 17.79,31.344 19.309,31.344 19.817,31.852 20.98,31.852 22.177,33.049 U1.8@23.346,33.049
EN: U1.27 U7.6 | length 15.8
  Top Layer w0.203: U1.27@28.946,29.849 28.946,29.093 29.621,28.418 31.044,28.418 31.572,27.889 v1(31.572,24.968) ; U7.6@32.025,20.447 32.025,20.985
  Bottom Layer w0.203: v1(31.572,24.968) 31.572,23.876 31.471,23.774 31.242,23.546 30.384,23.546 30.333,23.495 29.566,22.728 29.566,21.509 29.57,21.504 29.57,21.026 30.18,20.417 30.197,20.417 30.294,20.32 31.43,20.32 31.826,20.716 v1(31.826,21.234)
GHU: D1.1 Q1.4 R1.1 R6.2 | length 17.2
  Top Layer w0.381: R1.1@69.564,15.367 69.564,16.788 D1.1@70.175,17.399 70.834,17.399 73.374,19.939 80.232,19.939 80.816,19.355 Q1.4@80.816,18.796 81.375,18.796 81.794,19.215 R6.2@83.026,19.215
GHV: D2.1 Q2.4 R2.1 R7.2 | length 16.3
  Top Layer w0.381: R2.1@69.516,40.005 69.516,41.505 D2.1@70.175,42.164 70.302,42.291 80.232,42.291 80.816,41.707 Q2.4@80.816,41.124 81.732,41.124 82.175,41.567 R7.2@83.026,41.567
GHW: D3.1 Q3.4 R3.1 R8.2 | length 16.9
  Top Layer w0.254: Q3.4@80.816,48.567 Q3.4@81.174,48.567
  Top Layer w0.381: R3.1@69.564,46.101 69.564,47.522 D3.1@70.175,48.133 71.009,48.967 71.541,48.967 72.339,49.765 80.251,49.765 80.816,49.2 Q3.4@80.816,48.567 ; Q3.4@81.174,48.567 81.667,49.06 R8.2@83.026,49.06
GLU: D5.1 Q4.4 R11.1 R14.2 | length 8.4
  Top Layer w0.381: R11.1@69.564,22.225 69.564,20.804 D5.1@70.175,20.193 71.603,20.193 72.358,20.948 R14.2@72.358,21.679 72.503,21.824 Q4.4@75.184,21.824
GLV: D6.1 Q5.4 R12.1 R15.2 | length 8
  Top Layer w0.381: D6.1@70.175,27.051 69.516,27.71 R12.1@69.516,29.083 69.605,29.172 R15.2@72.358,29.172 72.453,29.267 Q5.4@75.184,29.267
GLW: D7.1 Q6.4 R13.1 R16.2 | length 7.6
  Top Layer w0.381: R13.1@69.564,53.086 69.564,51.665 D7.1@70.175,51.054 70.772,51.651 R16.2@72.358,51.651 72.414,51.595 Q6.4@75.184,51.595
GND: C6.1 C7.2 C14.1 C19.1 C22.1 C24.2 C25.2 C26.2 C27.2 C30.1 C31.1 C34.2 C36.1 C37.2 C38.1 C39.1 C41.2 C42.2 C43.2 C44.2 C45.1 C46.1 C47.1 C48.1 C50.1 CN3.4 CN3.8 CN3.10 CN3.12 CN4.1 CN5.3 D10.1 DS1.2 E1.2 E2.2 NT9.2 P2.5 Q7.2 R9.2 R10.1 R23.2 R24.1 R34.1 R37.1 R39.2 R46.2 R58.2 R60.1 R61.1 RP1.1 RS3.1 S1.1 S1.2 TP13.1 U1.0 U1.1 U1.9 U1.25 U1.31 U1.44 U5.3 U5.5 U6.1 U7.2 U7.15 X1.2 X1.4 | length 50.3
  Top Layer w0.2: U1.9@23.346,32.649 26.146,32.649 U1.0@26.746,33.249 ; U1.25@28.146,29.849 28.146,28.47 v1(28.829,27.788) ; U1.44@28.946,36.649 28.946,37.684
  Top Layer w0.203: v1(13.928,1.82) S1.1@14.925,1.82 ; v1(18.72,38.125) 18.72,37.592 19.126,37.186 C37.2@19.939,37.186 v1(19.939,36.576) 20.666,35.849 U1.1@23.346,35.849 ; X1.4@28.536,25.967 28.988,25.514 C39.1@29.997,25.514 30.201,25.717 v1(30.201,26.34) ; C46.1@31.877,23.889 31.877,24.335 32.436,24.894 C6.1@32.436,25.997 ; U7.15@33.909,19.533 34.625,19.533 U7.2@34.625,20.447 ; C45.1@34.383,23.889 v1(34.383,24.596) ; DS1.2@46.33,22.631 v1(47.701,22.631)
  Top Layer w0.254: U1.31@30.146,31.449 32.585,31.449 v1(33.172,30.861) ; RS3.1@61.944,15.696 61.995,15.747 v7(61.995,17.018)
  Top Layer w0.381: R9.2@44.374,15.824 v1(44.374,16.612)
  Top Layer w0.508: CN4.1@18.898,5.461 18.898,8.026 20.066,9.195 21.692,9.195 23.114,10.617 U5.5@23.114,13.703 ; v1(25.375,23.216) C38.1@25.375,23.914 25.522,23.767 X1.2@26.836,23.767
  Bottom Layer w0.254: v7(61.995,17.018) 62,17.023 NT9.2@62,18.034
  Bottom Layer w0.3: C36.1@28.042,27.837 28.091,27.788 C34.2@29.616,27.788
  Bottom Layer w0.508: CN4.1@18.898,5.461 20.765,7.328 C27.2@20.765,8.23 20.765,9.285 D10.1@19.588,10.461
  other v1: 16.027,10.058 13.233,10.795 34.95,11.1 23.139,15.138 27.076,17.069 39.395,17.094 39.395,17.92 24.359,17.983 39.395,18.745 32.055,18.898 32.901,18.898 33.731,18.898 34.595,18.898 38.938,22.581 38.735,23.292 38.608,24.028 33.452,25.857 34.265,25.857 35.077,25.857 10.846,26.924 10.846,28.321 12.624,29.794 33.934,30.861 25.502,31.852 26.281,31.852 27.059,31.852 27.838,31.852 27.059,32.868 27.838,32.868 25.502,33.884 26.281,33.884 27.059,33.884 27.838,33.884 25.502,34.9 26.281,34.9 27.059,34.9 27.838,34.9 20.396,36.119 30.254,38.303 31.775,43.561 31.877,47.65 23.8,49.225 15.799,49.911 50.698,52.705 47.269,52.73 43.967,52.959 40.411,53.315
  other v4: 64.77,8.901 66.065,8.901 83.058,8.966 84.353,8.966 64.77,9.934 66.065,9.934 83.058,9.999 84.353,9.999 64.77,10.967 66.065,10.967 83.058,11.032 84.353,11.032 64.77,12 66.065,12 83.058,12.065 84.353,12.065 56.921,13.106 58.09,13.106 56.921,14.656 58.09,14.656 56.921,16.205 58.09,16.205
  other v6: 35.077,0.958
HOU: D1.2 R1.2 TP3.1 U1.42 | length 53.2
  Top Layer w0.203: U1.42@30.146,35.849 42.41,35.849 42.421,35.86 42.923,35.86 42.934,35.849 43.037,35.849 v1(44.298,37.109)
  Top Layer w0.381: v1(46.431,27.94) 46.457,27.94 49.149,25.248 49.149,22.962 51.791,20.32 TP3.1@52,20.32 54.686,20.32 56.972,18.034 64.611,18.034 65.246,17.399 D1.2@66.825,17.399 67.532,16.692 R1.2@67.532,15.367
  Bottom Layer w0.254: v1(44.298,37.109) 44.633,36.774 44.633,29.764 46.431,27.965 v1(46.431,27.94)
HOV: D2.2 R2.2 TP4.1 U1.39 | length 46.1
  Top Layer w0.203: U1.39@30.146,34.649 39.172,34.649 40.01,33.811 v1(42.142,33.811)
  Top Layer w0.381: v1(43.129,32.029) v1(45.263,34.163) ; TP4.1@52,36.551 52,38.57 53.308,39.878 54.832,39.878 56.737,41.783 65.246,41.783 65.627,42.164 D2.2@66.825,42.164 67.484,41.505 R2.2@67.484,40.005
  Bottom Layer w0.381: v1(42.142,33.811) 43.129,32.823 v1(43.129,32.029) ; v1(45.263,34.163) 45.314,34.112 47.752,36.551 TP4.1@52,36.551
HOW: D3.2 R3.2 TP5.1 U1.36 | length 49.5
  Top Layer w0.203: U1.36@30.146,33.449 35.589,33.449 36.728,32.309 41.656,32.309 43.028,33.68
  Top Layer w0.254: 43.028,33.68 v1(45.491,36.144)
  Top Layer w0.381: v1(49.682,37.363) 49.708,37.389 49.708,39.669 TP5.1@52,41.961 52,41.999 55.086,45.085 55.086,47.625 56.356,48.895 66.063,48.895 D3.2@66.825,48.133 67.532,47.426 R3.2@67.532,46.101
  Bottom Layer w0.381: v1(45.491,36.144) 45.771,36.144 45.822,36.093 47.092,37.363 v1(49.682,37.363)
INH: R22.2 R61.2 U1.30 U7.7 | length 28.8
  Top Layer w0.203: R22.2@21.209,29.223 22.162,29.223 v1(22.428,28.956) ; U1.30@30.146,31.049 31.207,31.049 v1(31.75,30.505) ; v1(30.861,21.184) 31.375,20.67 U7.7@31.375,20.447
  S1 w0.203: v1(22.428,28.956) 22.479,29.007 29.058,29.007 30.556,30.505 v1(31.75,30.505) 33.02,29.235 33.02,26.568 32.385,25.933 32.385,22.708 v1(30.861,21.184)
  Bottom Layer w0.203: v1(30.861,21.184) 31.725,22.047 32.812,22.047 33.193,22.428 R61.2@34.303,22.428
LDO_IN: C24.1 R47.1 R48.1 U1.29 | length 27
  Top Layer w0.203: U1.29@30.146,30.649 30.489,30.649 31.547,29.591 32.258,29.591 33.045,28.804
  Top Layer w0.508: 33.045,28.727 C24.1@34.544,27.229 35.738,27.229 37.389,25.578 37.389,12.725 37.998,12.116 R48.1@39.228,12.116 R47.1@39.228,14.859
LIN_BUS: C27.1 CN4.2 D10.2 U5.6 | length 14.5
  Top Layer w0.508: CN4.2@23.978,5.461 24.384,5.867 U5.6@24.384,13.703
  Bottom Layer w0.508: D10.2@23.388,10.461 22.365,9.437 C27.1@22.365,8.23 22.365,7.074 CN4.2@23.978,5.461
LOU: D5.2 R11.2 TP10.1 U1.34 | length 46.3
  Top Layer w0.203: U1.34@30.146,32.649 35.068,32.649 37.059,30.658 46.152,30.658 v1(46.558,31.064)
  Top Layer w0.381: v1(47.549,29.058) 48.673,29.058 TP10.1@52,25.73 52.47,25.73 54.832,23.368 54.832,22.155 57.429,19.558 64.865,19.558 65.5,20.193 D5.2@66.825,20.193 67.532,20.9 R11.2@67.532,22.225
  Bottom Layer w0.203: v1(46.558,31.064) 46.558,30.048 v1(47.549,29.058)
LOV: D6.2 R12.2 TP11.1 U1.32 | length 43.4
  Top Layer w0.203: U1.32@30.146,31.849 34.547,31.849 36.449,29.947 48.565,29.947 49.759,31.14 TP11.1@52,31.14
  Top Layer w0.381: TP11.1@52,31.14 52,28.74 52.8,27.94 53.816,27.94 54.705,27.051 D6.2@66.825,27.051 67.484,27.71 R12.2@67.484,29.083
LOW: D7.2 R13.2 TP12.1 U1.33 | length 56.1
  Top Layer w0.203: U1.33@30.146,32.249 34.884,32.249 36.83,30.302 46.939,30.302 47.523,30.886 v1(47.523,33.02)
  Top Layer w0.305: v1(47.523,33.02) 48.031,33.528 48.031,44.221 49.276,45.466 50.387,45.466 52,47.079 TP12.1@52,47.371
  Top Layer w0.381: TP12.1@52,47.371 55.429,50.8 65.5,50.8 65.754,51.054 D7.2@66.825,51.054 67.532,51.761 R13.2@67.532,53.086
MOTU: CN2.1 NT1.2 Q1.1 Q1.2 Q1.3 Q4.5 Q4.6 Q4.7 Q4.8 Q4.9 R6.1 R19.1 TP6.1 | length 93
  Top Layer w0.254: R19.1@41.239,56.382 41.239,58.156 42.52,59.436 89.916,59.436 92.043,57.309 92.043,53.626 94.488,51.181 95.853,51.181 99.155,47.879 99.155,30.702 98.453,30 CN2.1@96,30
  Top Layer w0.381: NT1.2@75.66,20.574 80.867,20.574
  other v2: 84.296,15.748 86.836,15.748 89.376,15.748 91.916,15.748 94.456,15.748 96.996,15.748 85.566,18.288 88.106,18.288 90.646,18.288 93.186,18.288 95.726,18.288 98.266,18.288 79.216,20.828 81.756,20.828 84.296,20.828 89.376,20.828 91.916,20.828 94.456,20.828 96.996,20.828 83.026,23.368 85.566,23.368 88.106,23.368 90.646,23.368 93.186,23.368 95.726,23.368 98.266,23.368 89.376,25.908 91.916,25.908 94.456,25.908 96.996,25.908 93.186,28.448 98.266,28.448
  other v3: 77.311,22.149 78.568,22.149 79.826,22.149 77.311,23.19 78.568,23.19 79.826,23.19 77.311,24.232 78.568,24.232 79.826,24.232 77.311,25.273 78.568,25.273 79.826,25.273
MOTV: CN2.2 NT2.2 Q2.1 Q2.2 Q2.3 Q5.5 Q5.6 Q5.7 Q5.8 Q5.9 R7.1 R32.1 TP8.1 | length 81.4
  Top Layer w0.254: R32.1@44.734,56.382 44.734,57.967 45.695,58.928 89.63,58.928 91.535,57.023 91.535,53.372 94.234,50.673 95.472,50.673 98.647,47.498 98.647,37.647 CN2.2@96,35
  Top Layer w0.381: NT2.2@75.667,35.814 v2@80.747,35.814
  other v2: 79.216,28.448 81.756,28.448 84.296,28.448 86.836,28.448 83.026,30.988 85.566,30.988 88.106,30.988 84.296,33.528 86.836,33.528 89.376,33.528 91.916,33.528 96.996,33.528 80.486,36.068 83.026,36.068 85.566,36.068 90.646,36.068 93.186,36.068 84.296,38.608 86.836,38.608 89.376,38.608 91.916,38.608 85.566,41.148 88.106,41.148 90.646,41.148
  other v3: 77.311,29.642 78.568,29.642 79.826,29.642 77.311,30.683 78.568,30.683 79.826,30.683 77.311,31.725 78.568,31.725 79.826,31.725 77.311,32.766 78.568,32.766 79.826,32.766
MOTW: CN2.3 NT3.2 Q3.1 Q3.2 Q3.3 Q6.5 Q6.6 Q6.7 Q6.8 Q6.9 R8.1 R45.1 TP9.1 | length 41.1
  Top Layer w0.254: R45.1@48.021,56.382 48.021,57.546 48.895,58.42 75.533,58.42 77.716,56.237 Q6.9@77.716,53
  Top Layer w0.381: NT3.2@75.66,50.4 81.375,50.4
  other v2: 93.186,43.688 95.726,43.688 84.296,46.228 86.836,46.228 89.376,46.228 91.916,46.228 94.456,46.228 85.566,48.768 88.106,48.768 90.646,48.768 93.186,48.768 95.726,48.768 84.296,51.308 89.376,51.308 91.916,51.308 83.026,53.848 85.566,53.848 88.106,53.848 90.646,53.848 79.216,56.388 81.756,56.388 84.296,56.388 86.836,56.388 89.376,56.388
  other v3: 77.438,51.994 78.695,51.994 79.953,51.994 77.438,53.035 78.695,53.035 79.953,53.035 77.438,54.077 78.695,54.077 79.953,54.077 77.438,55.118 78.695,55.118 79.953,55.118
NetC48_2: C48.2 C49.1 R63.1 R64.1 S1.3 S1.4 | length 13.4
  Top Layer w0.203: S1.4@10.425,1.82 10.425,7.232 v1(10.524,7.332) 10.425,7.432 S1.3@10.425,10.22
  Bottom Layer w0.203: v1(10.524,7.332) C49.1@10.524,8.231 R63.1@11.879,8.231 C48.2@13.234,8.231 R64.1@14.588,8.231
NetC50_2: C50.2 R65.1 R66.2 | length 4.2
  Top Layer w0.203: C50.2@32.525,11.227 32.525,12.253 R66.2@32.029,12.749 R65.1@34.468,12.749
NetCN1_1: CN1.1 D4.1 Q7.3
  other v4: 54.407,9.347 55.44,9.347 56.473,9.347 57.506,9.347 54.407,10.643 55.44,10.643 56.473,10.643 57.506,10.643 50.114,13.614 51.41,13.614 50.114,14.647 51.41,14.647 50.114,15.68 51.41,15.68 50.114,16.713 51.41,16.713
NetD8_A: D8.A D9.A D11.A R20.1 | length 7.6
  Top Layer w0.254: R20.1@36.779,43.205 38.813,43.205 38.864,43.155 ; D8.A@38.85,39.624 38.864,39.638 D9.A@38.864,42.367 38.864,43.155 ; D11.A@38.864,45.11 38.864,43.155
NetDS1_1: DS1.1 R4.2 | length 3
  Top Layer w0.254: DS1.1@46.33,24.381 47.104,24.381 v1(47.467,24.745)
  Bottom Layer w0.254: R4.2@45.745,24.745 v1(47.467,24.745)
NetJP1_1: JP1.1 R22.1 | length 2.3
  Top Layer w0.203: JP1.1@18.999,27.762 19.139,27.623 R22.1@21.209,27.623
NetNT4_2: NT4.2 Q5.1 Q5.2 Q5.3 R15.1 RS1.2 | length 2.7
  Top Layer w0.254: RS1.2@61.995,30.219 v6(61.995,32.131)
  Bottom Layer w0.254: v6(61.995,32.131) 62.001,32.138 NT4.2@62.001,32.893
  other v2: 60.42,32.004 63.468,32.004
  other v4: 60.554,28.321 62.014,28.321 63.475,28.321
NetNT5_2: NT5.2 Q6.1 Q6.2 Q6.3 R16.1 RS2.2 | length 2.5
  Top Layer w0.254: v7(61.995,51.689) 61.995,53.006 RS2.2@62,53.011
  Bottom Layer w0.254: v7(61.995,51.689) 62,51.684 NT5.2@62,50.546
  other v2: 57.372,53.34 58.896,53.34 56.61,54.864 58.134,54.864 59.658,54.864 61.182,54.864 62.706,54.864 64.23,54.864 57.372,56.388 58.896,56.388 60.42,56.388 61.944,56.388 63.468,56.388
NetQ7_1: Q7.1 R5.2 R9.1 | length 21.1
  Top Layer w0.254: v1(44.374,13.411) R9.1@44.374,14.224 R5.2@45.949,14.224 ; Q7.1@54.277,17.043 v1(55.118,17.043)
  Bottom Layer w0.254: v1(44.374,13.411) 44.374,15.72 43.744,16.351 43.744,18.026 45.237,19.52 47.18,19.52 48.641,18.059 52.502,18.059 53.518,17.043 v1(55.118,17.043)
NetR49_2: R49.2 R53.1 U5.2 | length 3.4
  Top Layer w0.203: v1(25.654,18.186) U5.2@25.654,19.418
  Bottom Layer w0.203: R53.1@24.371,19.076 R49.2@25.679,19.076 25.679,18.212 v1(25.654,18.186)
NetR51_2: R51.2 R52.2 U5.1 | length 3.4
  Top Layer w0.203: U5.1@26.924,19.418 26.924,18.263 v1(26.987,18.199)
  Bottom Layer w0.203: v1(26.987,18.199) R51.2@26.987,19.076 R52.2@28.296,19.076